# Altium PCB BLDC-Board.PcbDoc (part 1 of 7)
Units mm, origin at the board's own origin, x right, y up, seen from the top; angles counter-clockwise.
Board outline 150 x 117 mm, 4 copper layers (Top Layer, Layer 1, Layer 2, Bottom Layer), stack 1.566 mm thick; 307 components, 221 nets, 983 pads, 534 vias.
Unrouted connection lines stored in the file: 337.
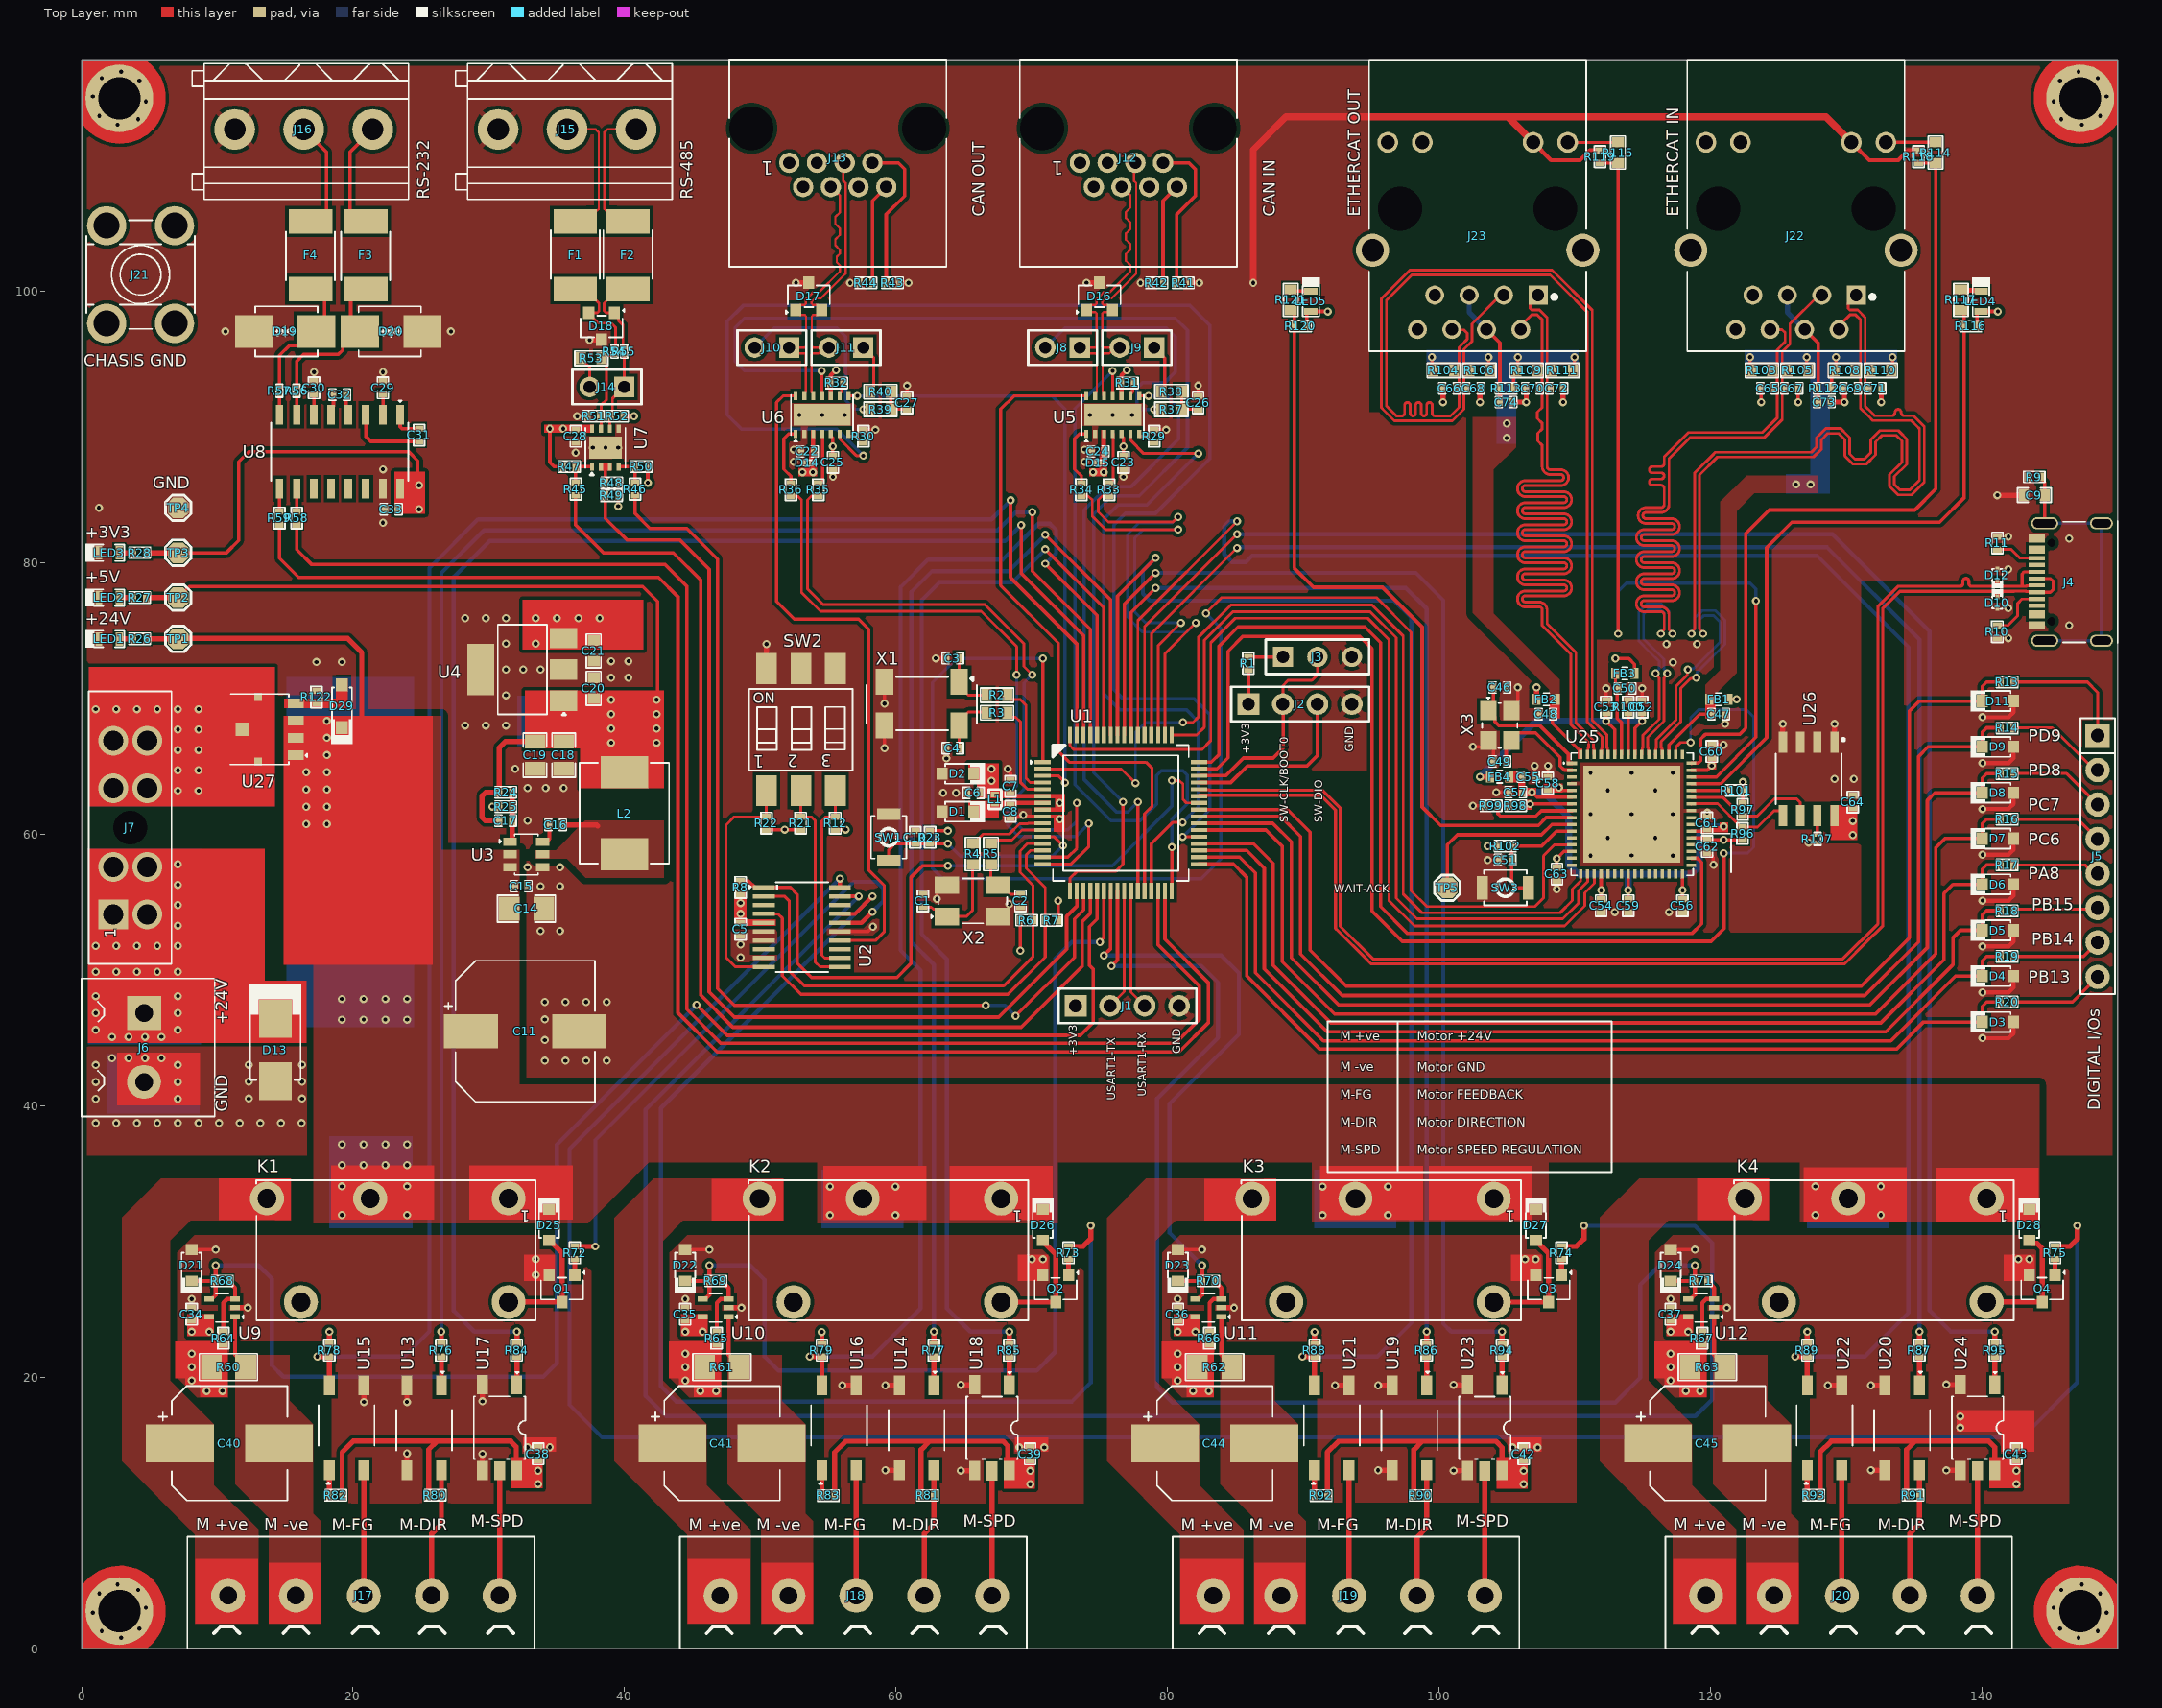
[diagram p0: Top Layer view]
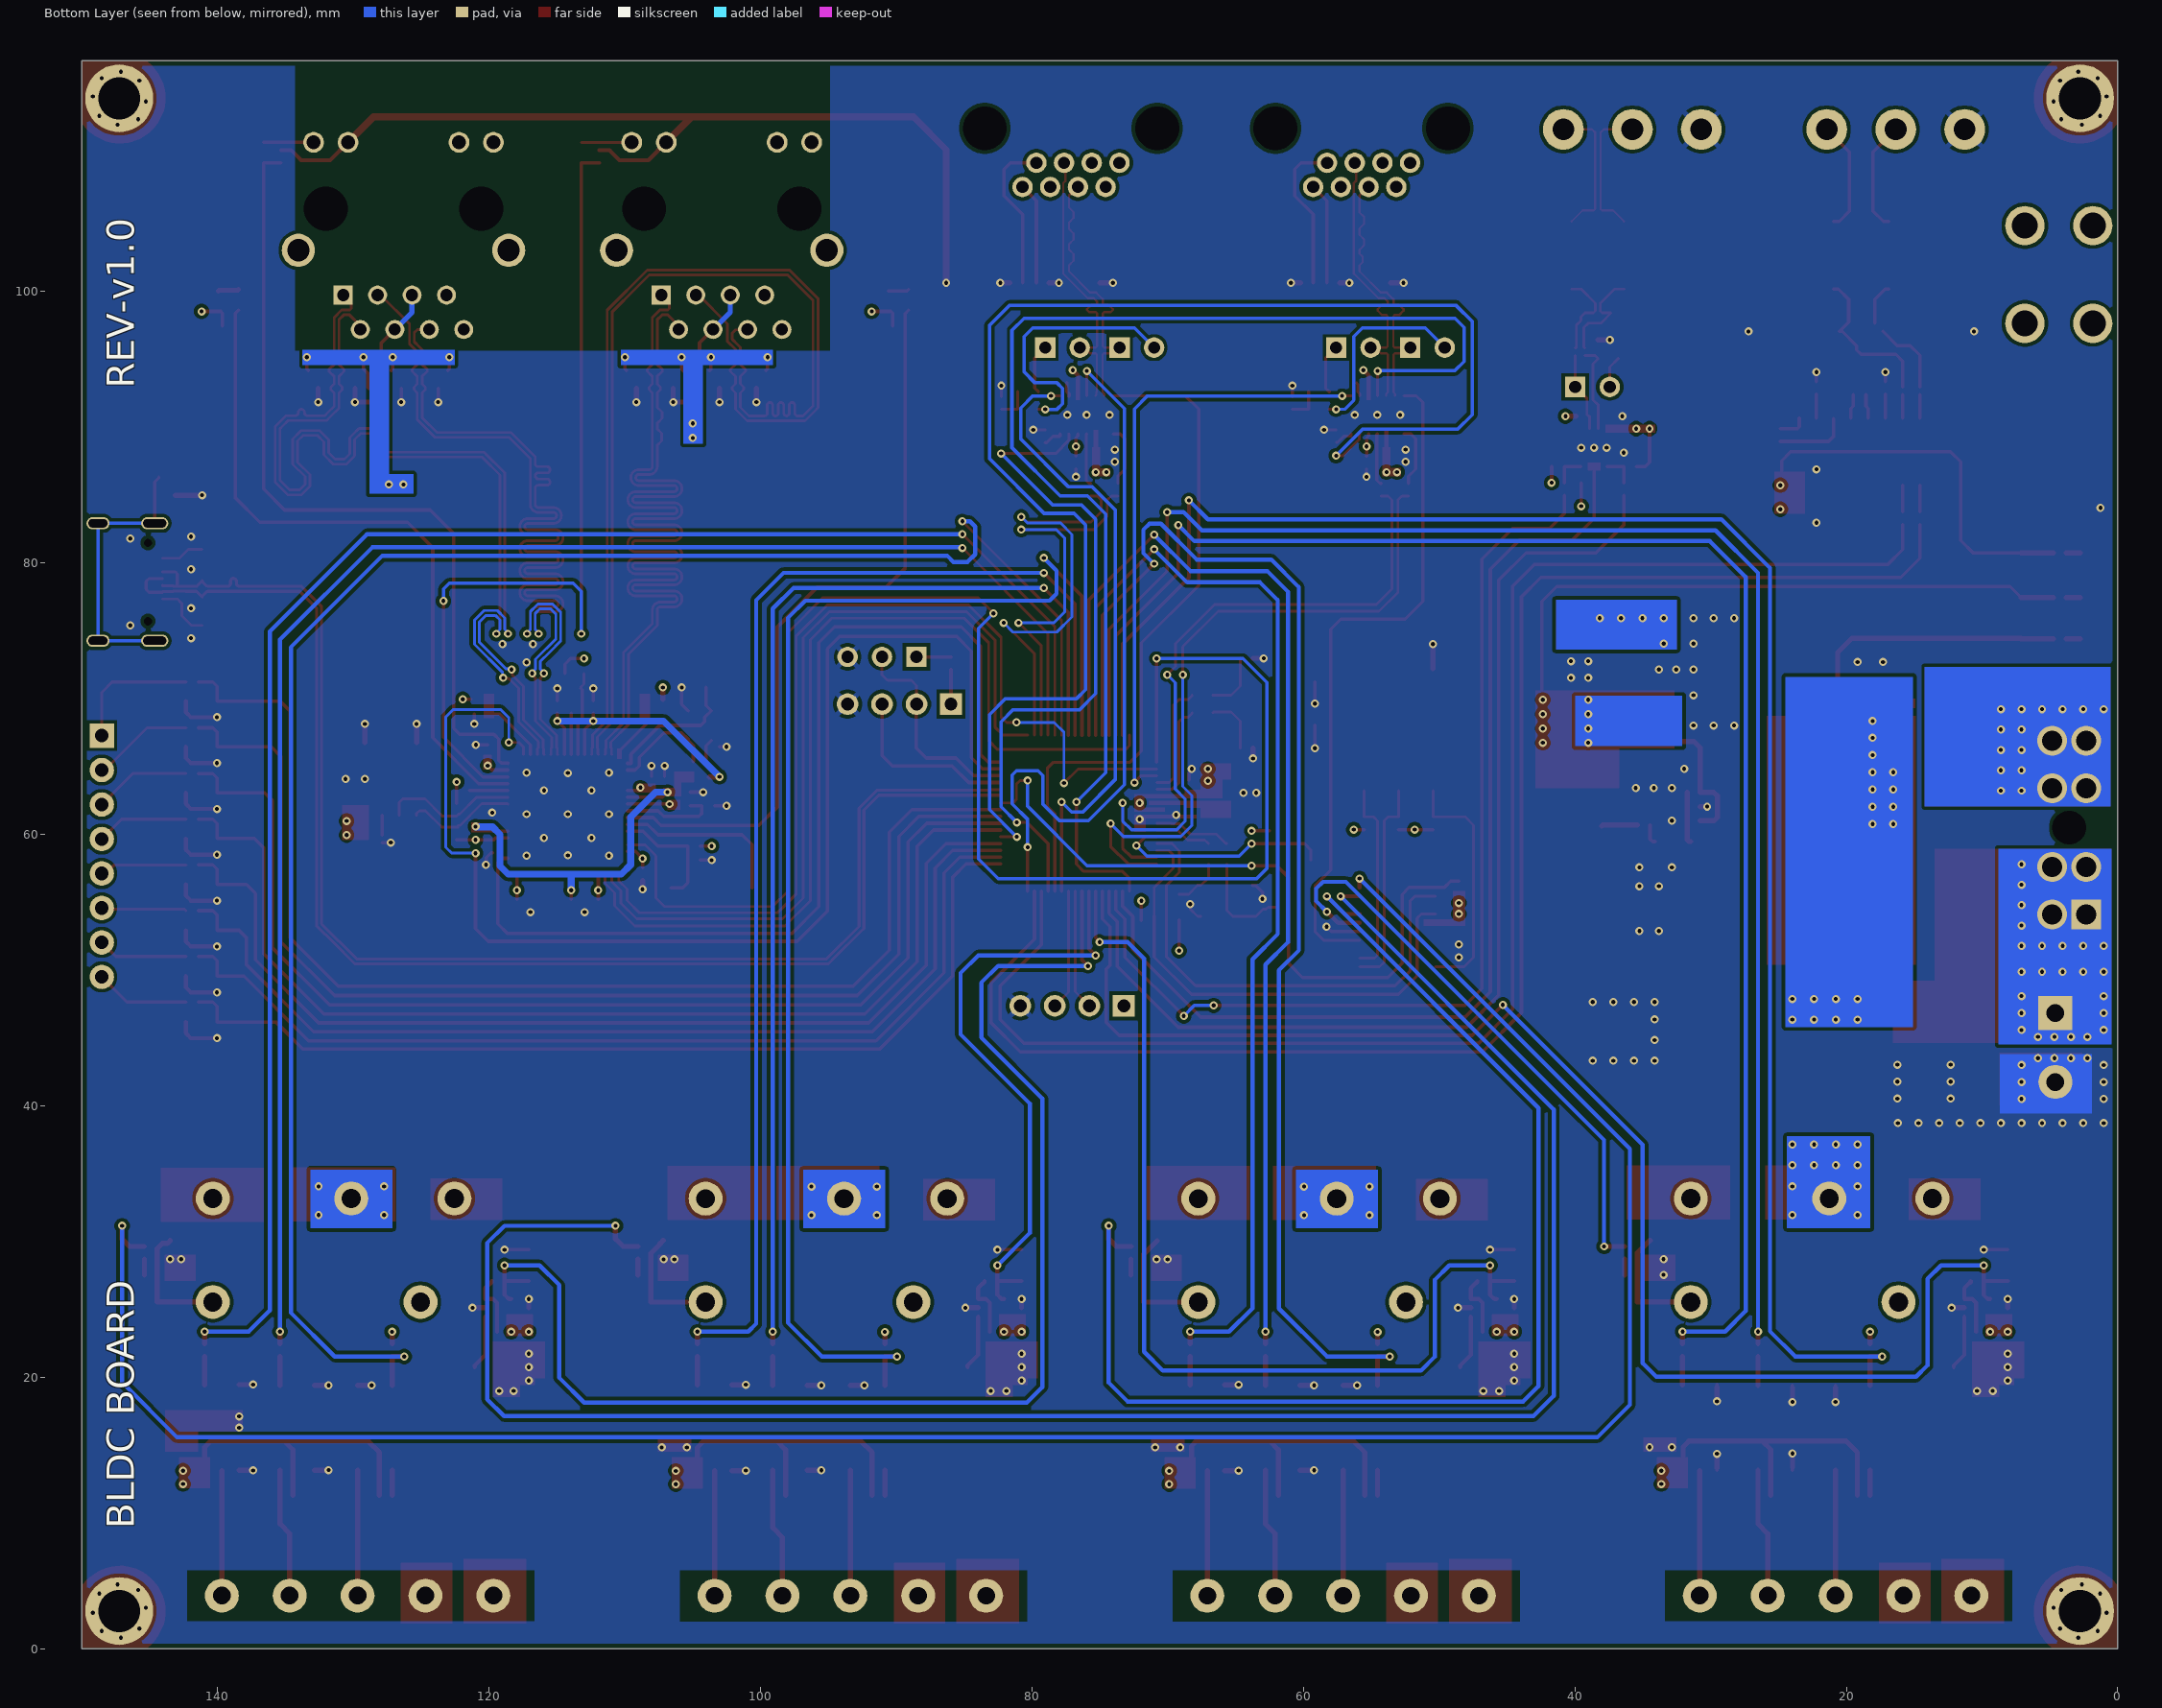
[diagram p1: Bottom Layer view, seen from below]
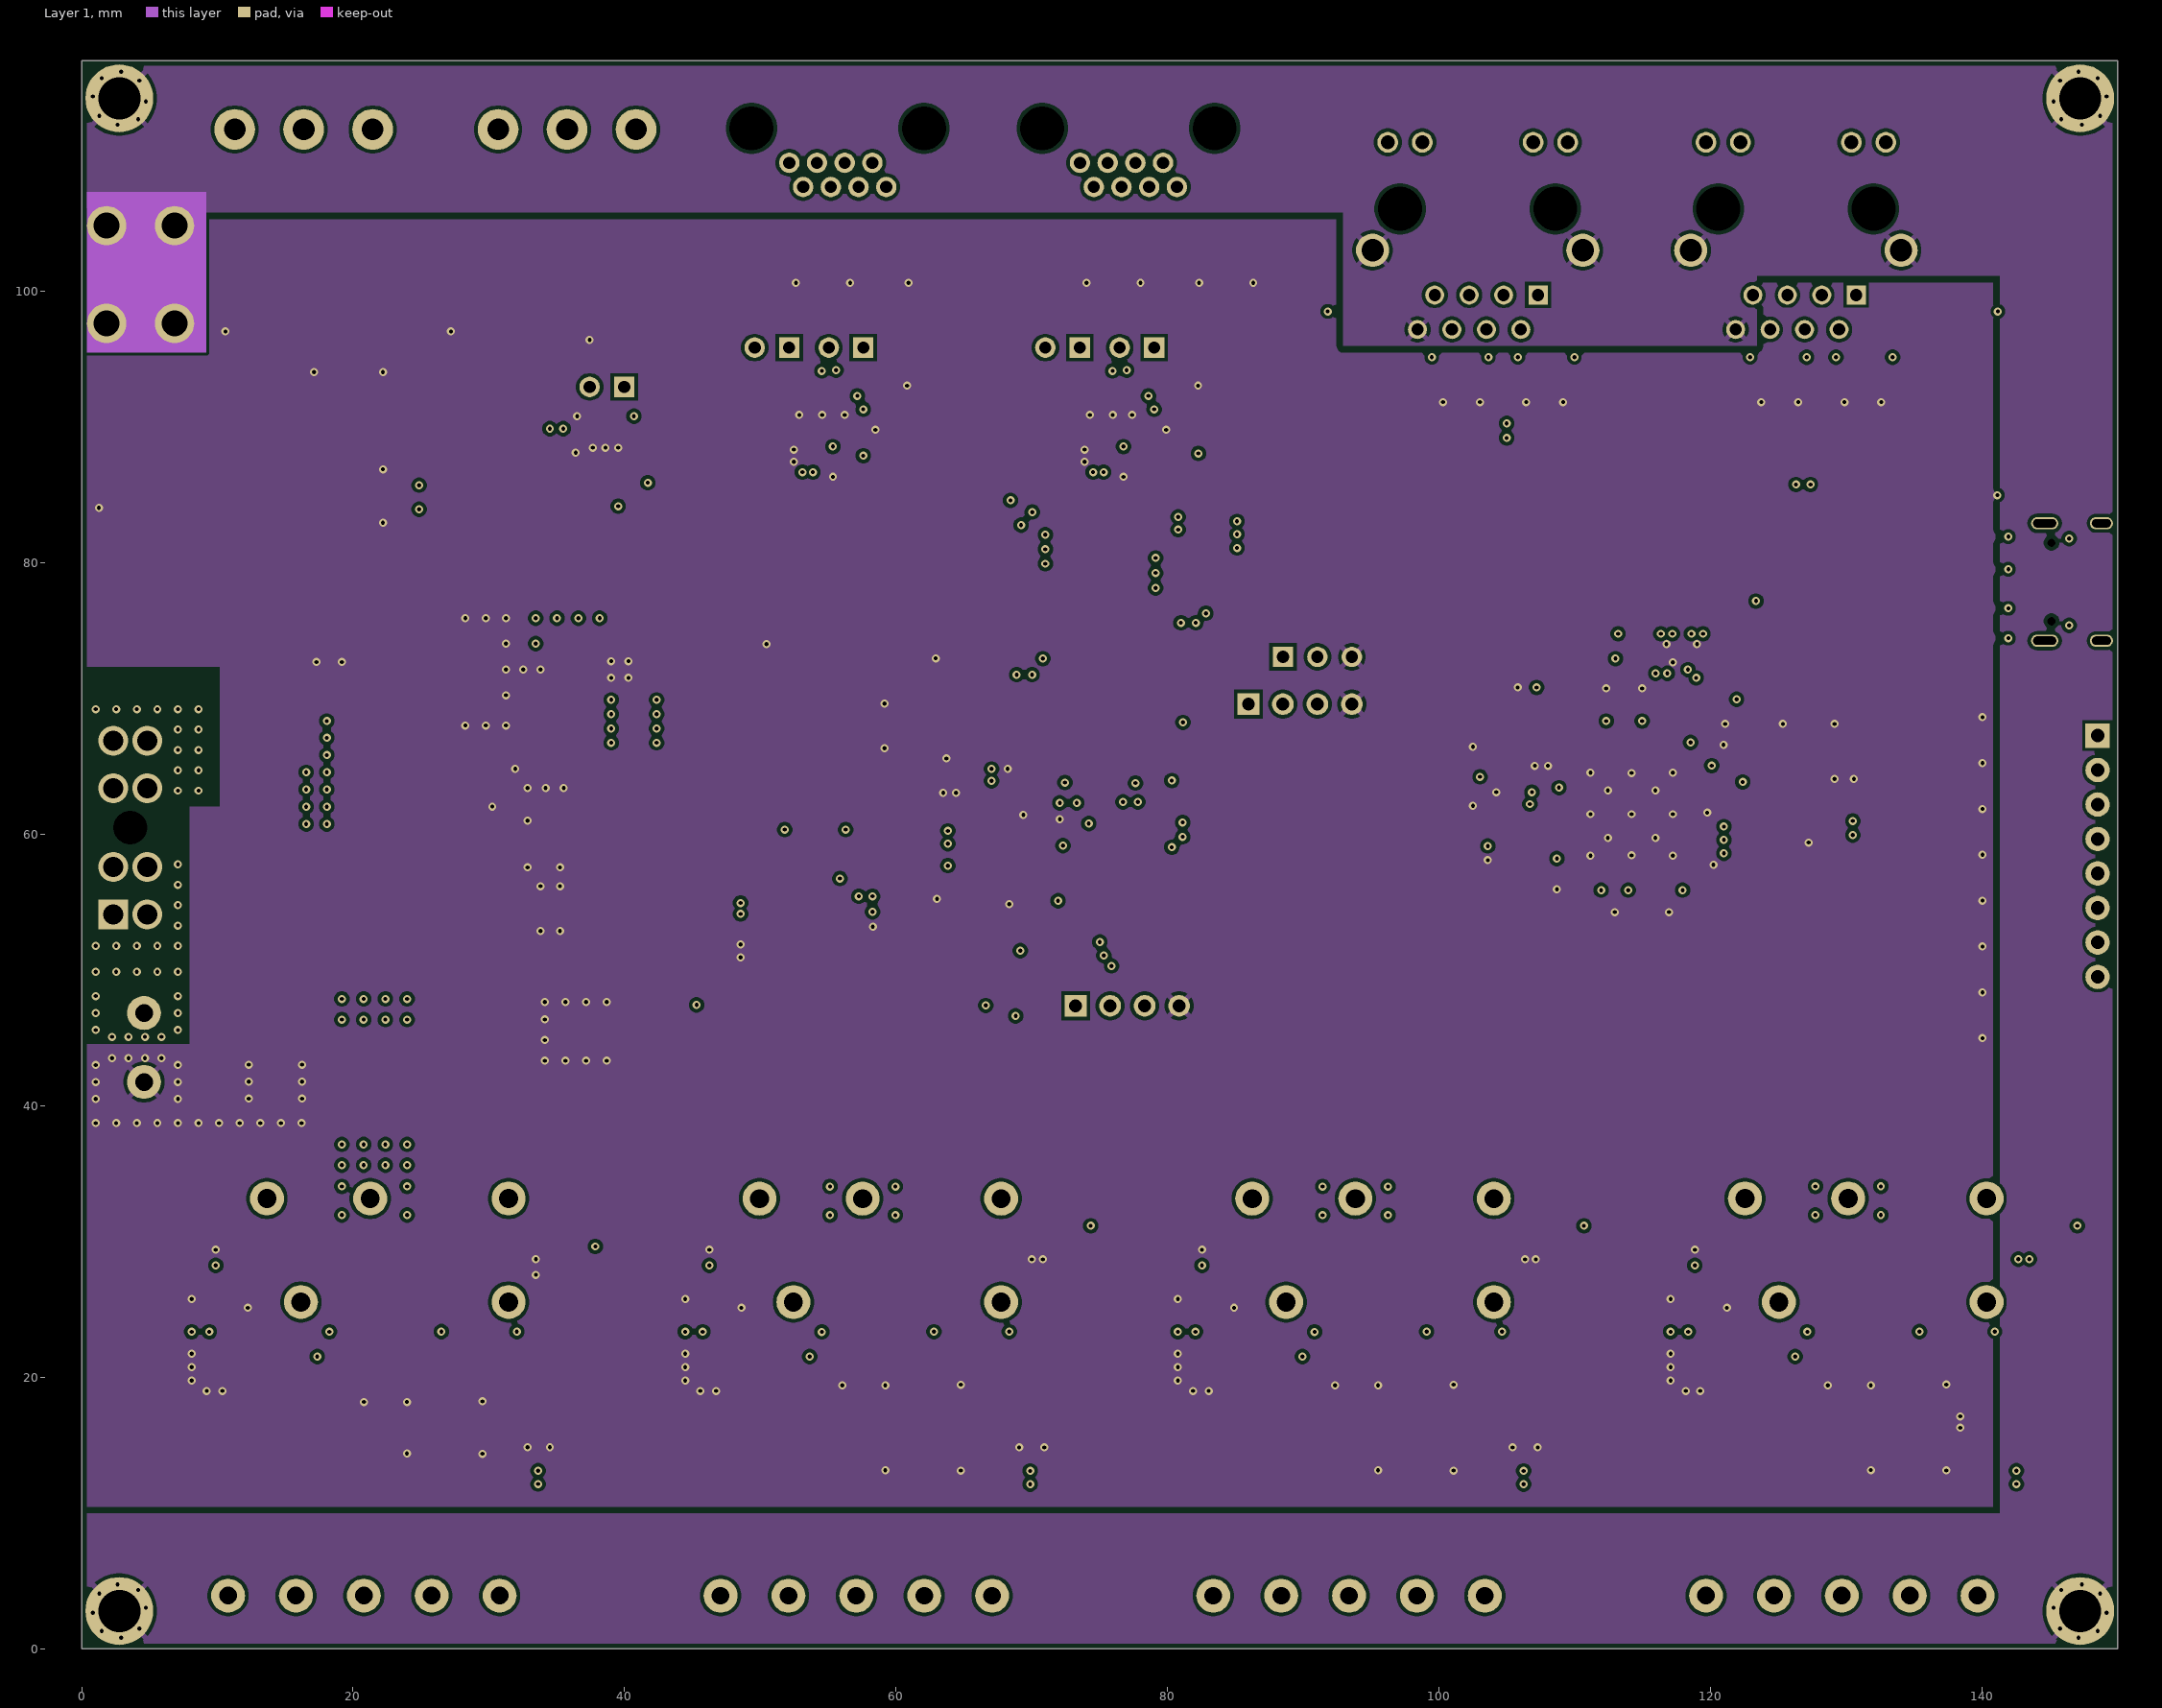
[diagram p2: Layer 1]
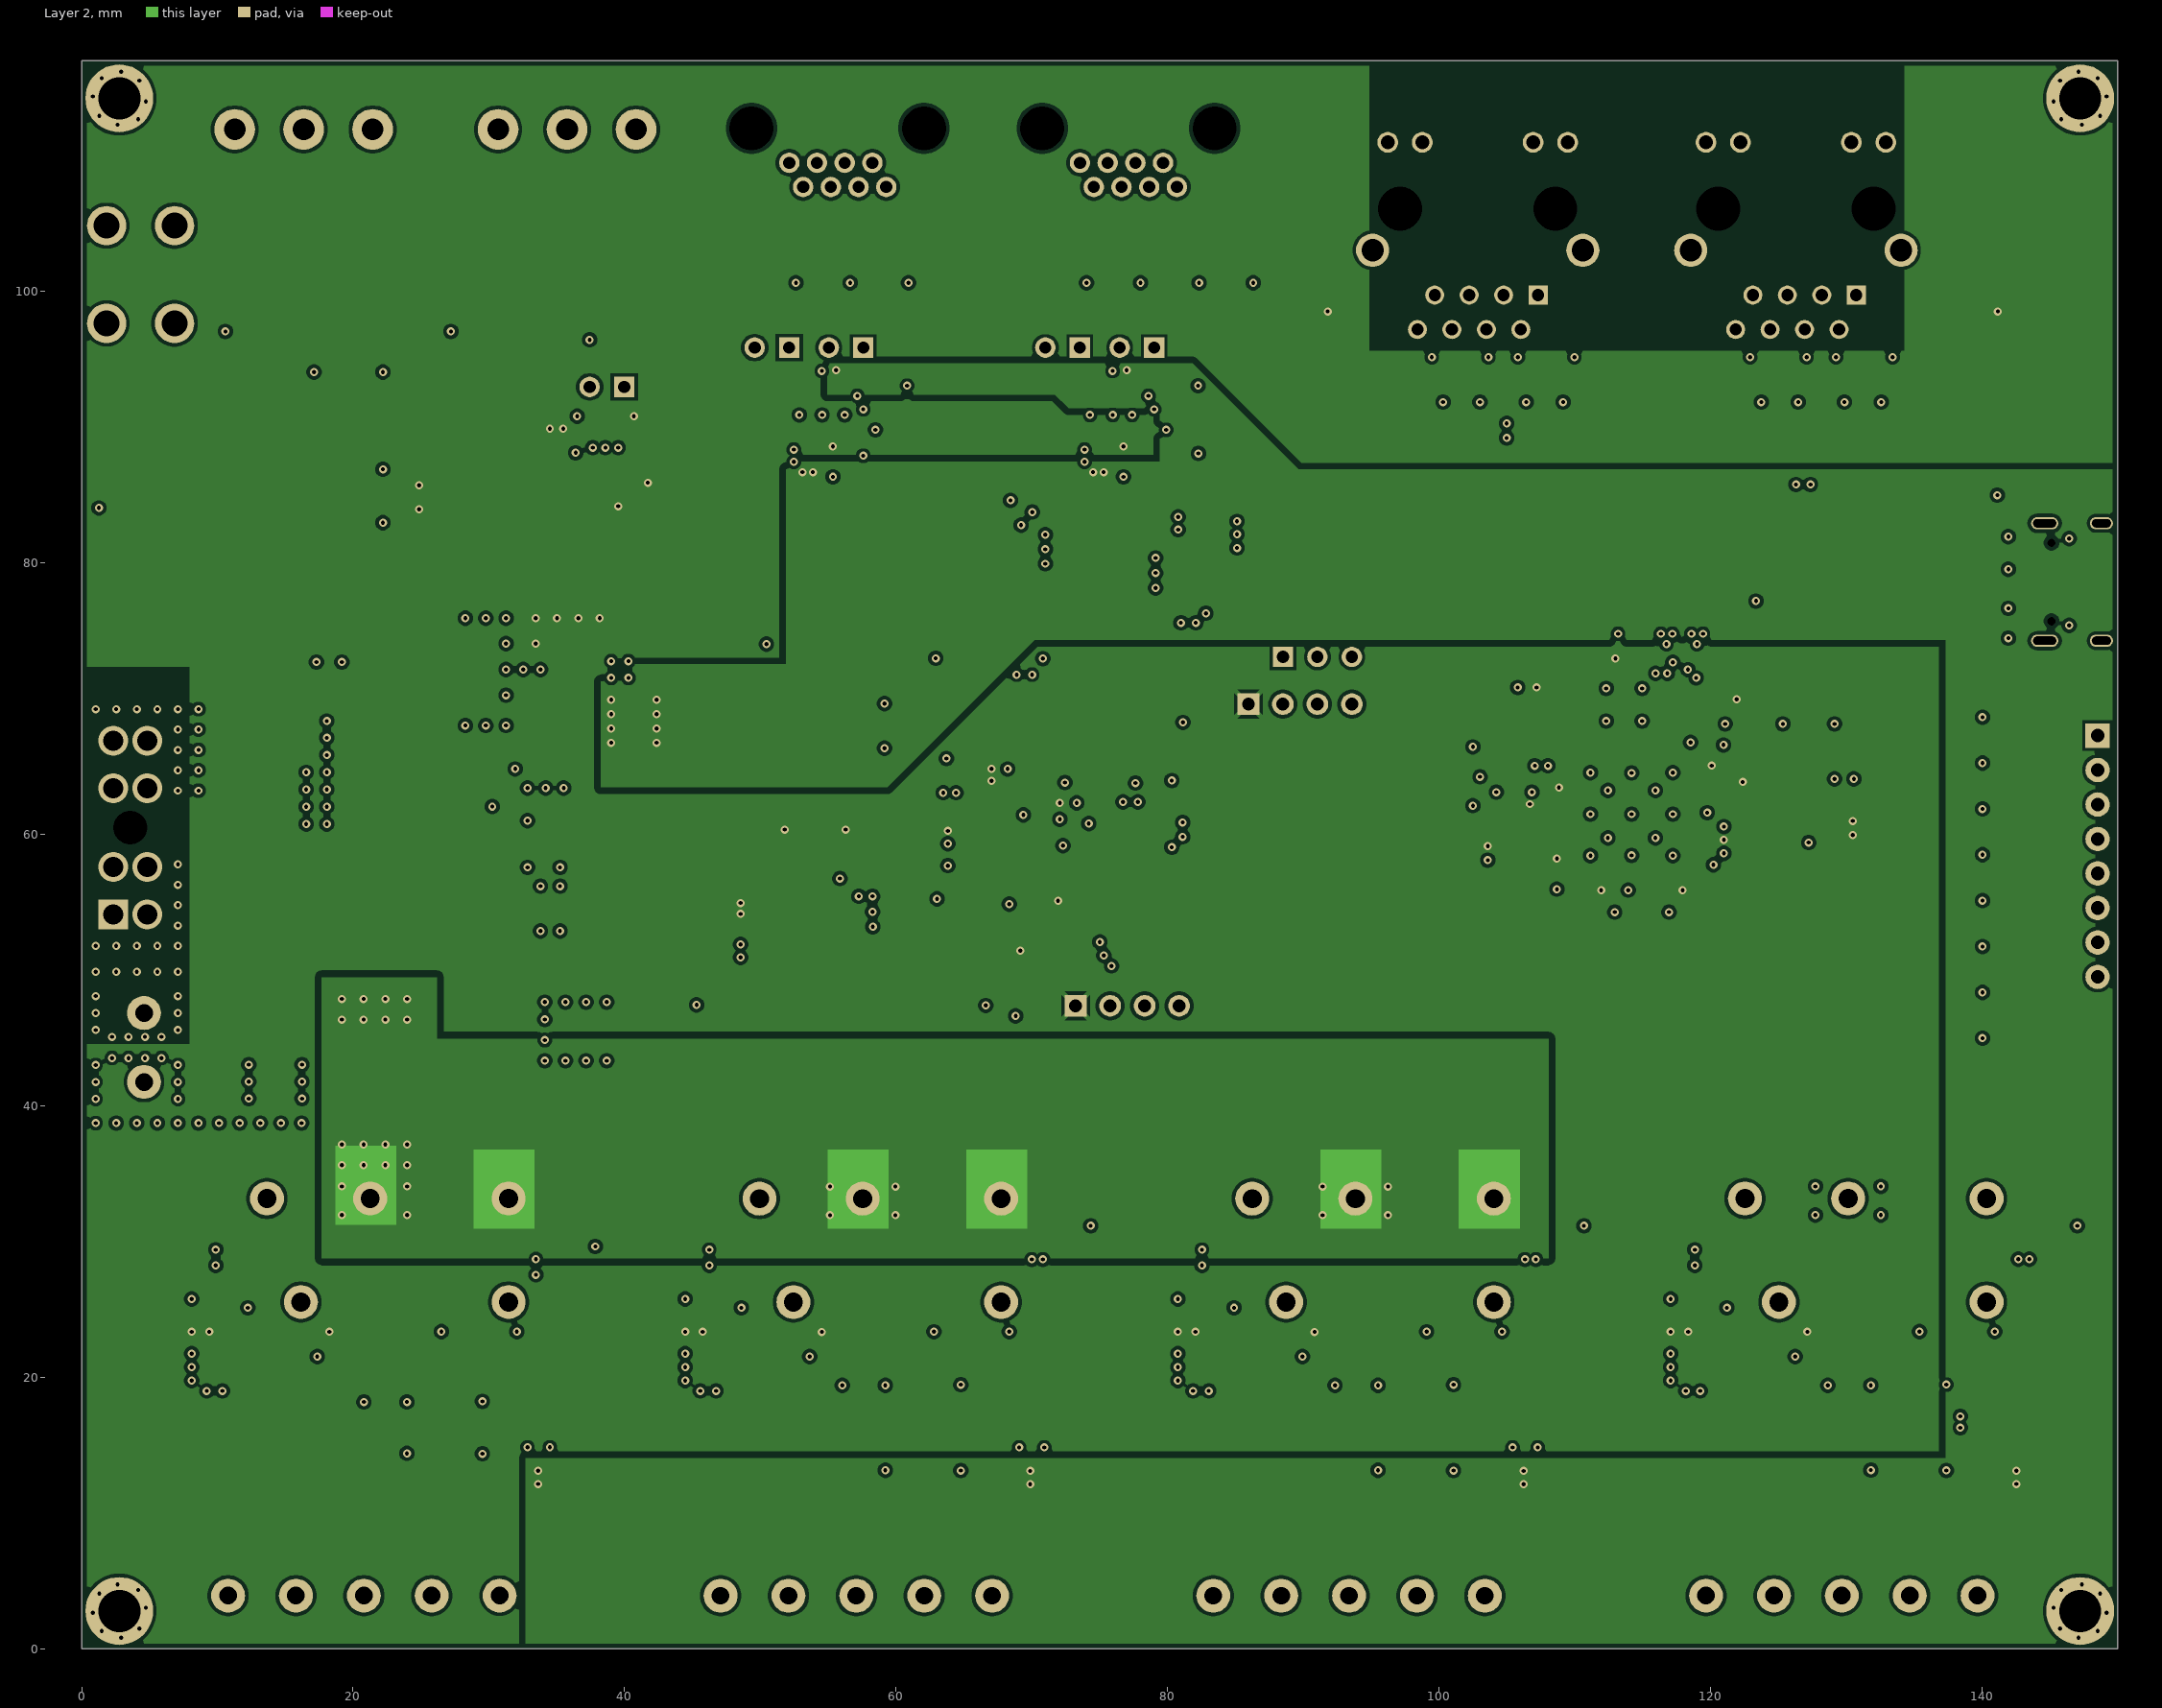
[diagram p3: Layer 2]
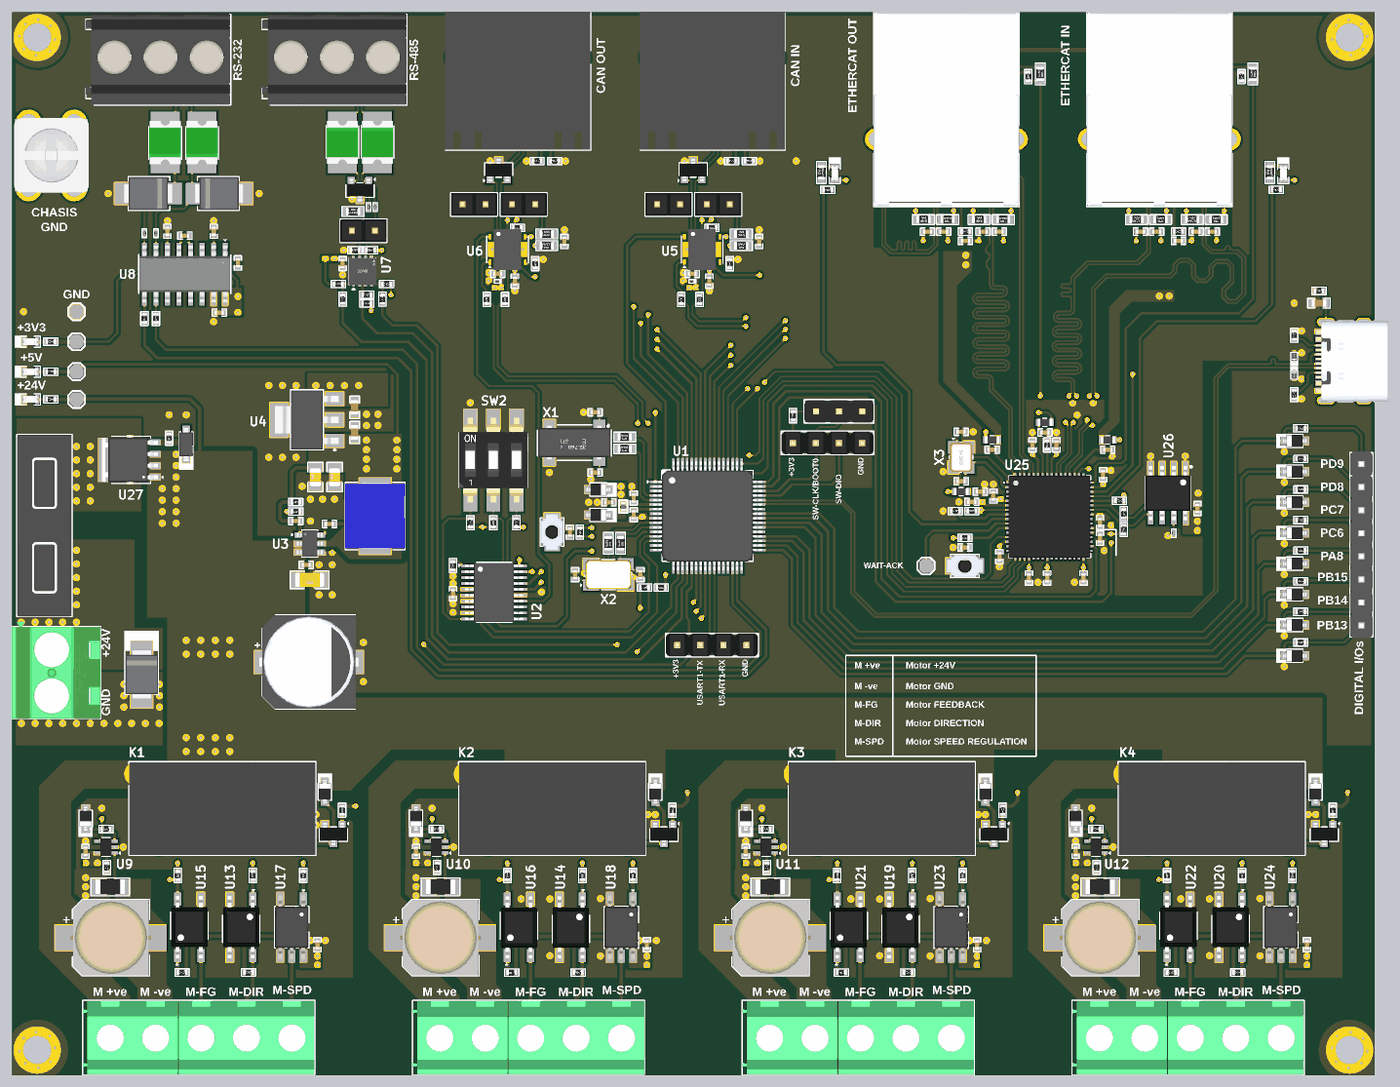
[diagram p7: 3D render of the assembled board from above, using the file's embedded part models]

## Layer stack, top to bottom
Top Solder: solder mask 0.02, Solder Resist, Dk 3.5
Top Layer: signal copper 0.035
Dielectric 2: prepreg 0.203, PP-006, Dk 4.4
Layer 1: signal copper 0.03
Dielectric 1: core 1.03, FR-4, Dk 4.6
Layer 2: signal copper 0.03
Dielectric 3: prepreg 0.203, PP-006, Dk 4.4
Bottom Layer: signal copper 0.035
Bottom Solder: solder mask 0.02, Solder Resist, Dk 3.5

## Board outline
0,0 0,117 150,117 150,0

## Design rules (kind name [scope] priority, off if disabled: settings)
BoardOutlineClearance [All] p1: gap=0 ignorepadtopadclearanceinfootprint=FALSE except(0.254: Fill-OutlineEdge; 0.381: Poly-OutlineEdge)
Clearance Clearance-CAN [All vs InDifferentialPairClass('CAN_Lines')] p1: gap=0.254 ignorepadtopadclearanceinfootprint=FALSE except(0.127: Arc-Arc Arc-Track Arc-THPad Track-Track Track-THPad SMDPad-Hole; 0.178: Arc-SMDPad Track-SMDPad SMDPad-SMDPad SMDPad-Fill Fill-Fill; 0.203: Track-Fill; 0.508: Poly-Poly)
Clearance [All] p2: gap=0.254 ignorepadtopadclearanceinfootprint=FALSE except(0.127: Arc-Arc Arc-Track Track-Track SMDPad-Hole; 0.178: Arc-SMDPad Track-SMDPad SMDPad-SMDPad SMDPad-Fill Fill-Fill; 0.203: Track-Fill; 0.508: Poly-Poly)
DiffPairsRouting RS485 [InDifferentialPairClass('RS485_LINES')] p1: maxlimit=0.254 minlimit=0.254 mostfreqgap=0.254 toplayer_minwidth=0.165 toplayer_maxwidth=0.165 toplayer_prefwidth=0.165 bottomlayer_minwidth=0.165 bottomlayer_maxwidth=0.165 bottomlayer_prefwidth=0.165 impedanceprofiledriven=TRUE impedanceprofileid={7B78C0C8-B38E-4F03-9150-63696339F07D} impedanceprofilevalue=120.000000 maxuncoupledlength=12.7
DiffPairsRouting ETHERCAT [InDifferentialPairClass('EtherCAT_A_Lines')] p2: maxlimit=0.254 minlimit=0.152 mostfreqgap=0.254 toplayer_maxgap=0.152 toplayer_prefgap=0.152 toplayer_minwidth=0.203 toplayer_maxwidth=0.203 toplayer_prefwidth=0.203 bottomlayer_maxgap=0.152 bottomlayer_prefgap=0.152 bottomlayer_minwidth=0.203 bottomlayer_maxwidth=0.203 bottomlayer_prefwidth=0.203 impedanceprofiledriven=TRUE impedanceprofileid={4AFB6B3D-FB50-4189-B201-DBFAAD689A74} impedanceprofilevalue=100.000000 maxuncoupledlength=12.7
DiffPairsRouting USB [InDifferentialPairClass('USB_PROGRAM_LINES')] p3: maxlimit=0.254 minlimit=0.127 mostfreqgap=0.254 toplayer_maxgap=0.127 toplayer_prefgap=0.127 toplayer_minwidth=0.229 toplayer_maxwidth=0.229 toplayer_prefwidth=0.229 bottomlayer_maxgap=0.127 bottomlayer_prefgap=0.127 bottomlayer_minwidth=0.229 bottomlayer_maxwidth=0.229 bottomlayer_prefwidth=0.229 impedanceprofiledriven=TRUE impedanceprofileid={D1DE48A6-6D34-48E4-B397-E0FB9A926E1D} impedanceprofilevalue=90.000000 maxuncoupledlength=12.7
DiffPairsRouting CAN [InDifferentialPairClass('CAN_Lines')] p4: maxlimit=0.254 minlimit=0.254 mostfreqgap=0.254 toplayer_minwidth=0.165 toplayer_maxwidth=0.165 toplayer_prefwidth=0.165 bottomlayer_minwidth=0.165 bottomlayer_maxwidth=0.165 bottomlayer_prefwidth=0.165 impedanceprofiledriven=TRUE impedanceprofileid={7B78C0C8-B38E-4F03-9150-63696339F07D} impedanceprofilevalue=120.000000 maxuncoupledlength=12.7
HoleSize [All] p1: absolutevalues=TRUE maxlimit=3.81 minlimit=0.025 maxpercent=80.000 minpercent=20.000
MatchedLengths "Schematic Matched Net Lengths_2" [InNetClass('USB_PROGRAM')] p1: tolerance=1.27 checknetsindiffpair=TRUE checkdiffpairvsdiffpair=FALSE checkxsignals=FALSE checkothers=FALSE
MatchedLengths "Schematic Matched Net Lengths_1" [InNetClass('EtherCAT_A')] p2: tolerance=0.645 checknetsindiffpair=FALSE checkdiffpairvsdiffpair=TRUE checkxsignals=TRUE checkothers=TRUE
MatchedLengths "Schematic Matched Net Lengths" [InNetClass('RS485')] p3: tolerance=0.508 checknetsindiffpair=TRUE checkdiffpairvsdiffpair=FALSE checkxsignals=FALSE checkothers=FALSE
MaxMinImpedance "Schematic Impedance Constraint_2" [InNetClass('RS485')] p1: minimum=115.0 maximum=125.0
MaxMinImpedance "Schematic Impedance Constraint_1" [InNetClass('EtherCAT_A')] p2: minimum=85.00 maximum=95.00
MaxMinImpedance "Schematic Impedance Constraint" [InNetClass('USB_PROGRAM')] p3: minimum=85.00 maximum=90.00
MinimumSolderMaskSliver [All] p1: minsoldermaskwidth=0
PolygonConnect [All] p1: thpad.connectstyle=Relief thpad.reliefconductorwidth=0.381 thpad.reliefentries=4 thpad.polygonreliefangle="45 Angle" thpad.airgapwidth=0.254 smdpad.connectstyle=Direct smdpad.reliefconductorwidth=0.254 smdpad.reliefentries=4 smdpad.polygonreliefangle="90 Angle" smdpad.airgapwidth=0.254 via.connectstyle=Direct via.reliefconductorwidth=0.254 via.reliefentries=4 via.polygonreliefangle="90 Angle" via.airgapwidth=0.254
RoutingVias [All] p1: holewidth=0.3 width=0.6 viastyle="Through Hole" minholewidth=0.3 minwidth=0.6 maxholewidth=0.3 maxwidth=0.6
SilkToSilkClearance [All] p1: silktosilkclearance=0
SilkToSolderMaskClearance [IsPad] p1: minsilkscreentomaskgap=0 clearancetoexposedcopper=TRUE
SolderMaskExpansion [All] p1: expansion=0.102 istentingtop=FALSE
SupplyNets "Schematic Supply Nets_9" [InNet('VDD33TXRX1')] p1: voltage=0.000
SupplyNets "Schematic Supply Nets_8" [InNet('+3V3')] p2: voltage=0.000
SupplyNets "Schematic Supply Nets_7" [InNet('VDD33TXRX2')] p3: voltage=0.000
SupplyNets "Schematic Supply Nets_6" [InNet('CHASIS GND')] p4: voltage=0.000
SupplyNets "Schematic Supply Nets_5" [InNet('GND')] p5: voltage=0.000
SupplyNets "Schematic Supply Nets_4" [InNet('+5V')] p6: voltage=0.000
SupplyNets "Schematic Supply Nets_3" [InNet('VBUS')] p7: voltage=0.000
SupplyNets "Schematic Supply Nets_2" [InNet('+24V')] p8: voltage=0.000
SupplyNets "Schematic Supply Nets_1" [InNet('VDDCR')] p9: voltage=0.000
SupplyNets "Schematic Supply Nets" [InNet('VDD12TX1')] p10: voltage=0.000
UnRoutedNet [All] p1: checkbadconnections=TRUE
Width [All] p1: maxlimit=0.508 minlimit=0.203 preferedwidth=0.254 midlayer1_minwidth=0.254 midlayer1_maxwidth=0.254 midlayer2_minwidth=0.254 midlayer2_maxwidth=0.254 minimp=50.000000 maximp=50.000000 favimp=50.000000
24 further rules are at their usual default settings.

## Classes and differential pairs
differential pair class USB_PROGRAM_LINES: USB
differential pair class RS485_LINES: RS485
differential pair class EtherCAT_A_Lines: RXA RXB TXA TXB
differential pair class CAN_Lines: CAN1 CAN2
net class USB_PROGRAM: USB_N USB_P
net class RS485: RS485_N RS485_P
net class EtherCAT_A: RXA_N RXA_P RXB_N RXB_P TXA_N TXA_P TXB_N TXB_P
net class CAN: CAN1_N CAN1_P CAN2_N CAN2_P
component class U_RS485_RS232_Sheet: C28 C29 C30 C31 C32 C33 D18 D19 D20 F1 F2 F3 F4 J14 R45 R46 R47 R48 R49 R50 R51 R52 R53 R54 R55 R56 R57 R58 R59 U7 U8
component class U_Power_Sheet: C11 C14 C15 C16 C17 C18 C19 C20 C21 D13 D29 J6 J7 L2 LED1 LED2 LED3 R24 R25 R26 R27 R28 R122 TP1 TP2 TP3 TP4 U3 U4 U27
component class U_Motor_Driver_Sheet: C34 C35 C36 C37 D21 D22 D23 D24 D25 D26 D27 D28 K1 K2 K3 K4 Q1 Q2 Q3 Q4 R60 R61 R62 R63 R64 R65 R66 R67 R68 R69 R70 R71 R72 R73 R74 R75 U9 U10 U11 U12
component class U_EtherCAT_Sheet: C46 C47 C48 C49 C50 C51 C52 C53 C54 C55 C56 C57 C58 C59 C60 C61 C62 C63 C64 C65 C66 C67 C68 C69 C70 C71 C72 C73 C74 FB1 FB2 FB3 FB4 J21 J22 J23 LED4 LED5 R96 R97 R98 R99 R100 R101 R102 R103 R104 R105 R106 R107 R108 R109 R110 R111 R112 R113 R114 R115 R116 R117 R118 R119 R120 R121 SW3 TP5 U25 U26 X3
component class U_Controller_Sheet: C1 C2 C3 C4 C5 C6 C7 C8 C9 C10 D1 D2 D3 D4 D5 D6 D7 D8 D9 D10 D11 D12 J1 J2 J3 J4 J5 L1 R1 R2 R3 R4 R5 R6 R7 R8 R9 R10 R11 R12 R13 R14 R15 R16 R17 R18 R19 R20 R21 R22 R23 SW1 SW2 U1 U2 X1 X2
component class U_Connector_Sheet2: C42 C43 C44 C45 J19 J20 R86 R87 R88 R89 R90 R91 R92 R93 R94 R95 U19 U20 U21 U22 U23 U24
component class U_Connector_Sheet1: C38 C39 C40 C41 J15 J16 J17 J18 R76 R77 R78 R79 R80 R81 R82 R83 R84 R85 U13 U14 U15 U16 U17 U18
component class U_CAN_Sheet: C22 C23 C24 C25 C26 C27 D14 D15 D16 D17 J8 J9 J10 J11 J12 J13 R29 R30 R31 R32 R33 R34 R35 R36 R37 R38 R39 R40 R41 R42 R43 R44 U5 U6
differential pair USB: +USB_P -USB_N
differential pair TXB: +TXB_P -TXB_N
differential pair TXA: +TXA_P -TXA_N
differential pair RXB: +RXB_P -RXB_N
differential pair RXA: +RXA_P -RXA_N
differential pair RS485: +RS485_P -RS485_N
differential pair CAN2: +CAN2_P -CAN2_N
differential pair CAN1: +CAN1_P -CAN1_N

## Components (designator, comment, footprint, x,y, rotation, side; value= is the part's Value field where it differs from the comment)
C1 "30pF" Cap-0402 61.981,55.097 r270 top
C2 "30pF" Cap-0402 69.169,55.097 r90 top
C3 "DNP" Cap-0402 64.173,72.968 r0 top value=6.8pF
C4 "DNP" Cap-0402 64.173,66.338 r180 top value=6.8pF
C5 "100nF" cap-0402 48.539,53.011 r90 top
C6 "4.7uF" Cap-0402 65.697,63.062 r0 top
C7 "100nF" cap-0402 68.428,63.532 r270 top
C8 "0.1uF" Cap-0402 68.428,61.693 r90 top value=100nF
C9 "4.7nF" Cap-0603 143.848,84.982 r0 top
C10 "0.1uF" Cap-0402 61.409,59.783 r270 top value=100nF
C11 "220uF" UCD-220uF-10mmDia 32.676,45.478 r0 top
C14 "10uF" Cap-1206 32.766,54.527 r180 top
C15 "100nF" cap-0402 32.385,56.178 r180 top
C16 "0.1uF" Cap-0402 34.927,60.681 r180 top
C17 "47pF" Cap-0402 31.24,60.998 r180 top
C18 "22uF" Cap-0805 35.509,65.83 r90 top
C19 "22uF" Cap-0805 33.401,65.83 r90 top
C20 "4.7uF" Cap-0603 37.719,70.758 r270 top
C21 "4.7uF" Cap-0603 37.719,73.516 r90 top
C22 "0.1uF" Cap-0402 53.465,88.208 r180 top value=100nF
C23 "0.1uF" Cap-0402 76.75,87.395 r90 top value=100nF
C24 "0.1uF" Cap-0402 74.879,88.208 r180 top value=100nF
C25 "0.1uF" Cap-0402 55.347,87.395 r90 top value=100nF
C26 "4.7nF" Cap-0402 82.245,91.776 r90 top
C27 "4.7nF" Cap-0402 60.808,91.776 r90 top
C28 "0.1uf" Cap-0402 36.395,89.332 r90 top
C29 "0.1uf" Cap-0402 22.197,92.894 r270 top
C30 "0.1uf" Cap-0402 17.117,92.894 r270 top
C31 "0.1uf" Cap-0402 24.867,89.414 r270 top
C32 "0.1uf" Cap-0402 19.022,92.399 r180 top
C33 "0.1uf" Cap-0402 22.809,83.94 r0 top
C34 "100nF" cap-0402 8.106,24.646 r270 top
C35 "100nF" cap-0402 44.462,24.646 r270 top
C36 "100nF" cap-0402 80.759,24.646 r270 top
C37 "100nF" cap-0402 117.059,24.646 r270 top
C38 "100nF" cap-0402 33.625,14.365 r270 top
C39 "100nF" cap-0402 69.875,14.357 r270 top
C40 "100uF" UWX1E101MCL1GB_ 10.89,15.14 r0 top
C41 "100uF" UWX1E101MCL1GB_ 47.17,15.14 r0 top
C42 "100nF" cap-0402 106.223,14.357 r270 top
C43 "100nF" cap-0402 142.523,14.365 r270 top
C44 "100uF" UWX1E101MCL1GB_ 83.467,15.14 r0 top
C45 "100uF" UWX1E101MCL1GB_ 119.767,15.14 r0 top
C46 "30pF" Cap-0402 104.469,70.819 r180 top
C47 "100nF" cap-0402 120.608,68.853 r180 top
C48 "100nF" cap-0402 107.878,68.853 r0 top
C49 "30pF" Cap-0402 104.469,65.368 r0 top
C50 "100nF" cap-0402 113.694,70.748 r180 top
C51 "100nF" cap-0402 104.877,58.096 r0 top
C52 "100nF" cap-0402 114.952,69.374 r270 top
C53 "100nF" cap-0402 112.314,69.374 r270 top
C54 "100nF" cap-0402 111.935,54.734 r90 top
C55 "1uF" Cap-0402 106.578,64.231 r180 top
C56 "100nF" cap-0402 117.935,54.734 r90 top
C57 "470pF" Cap-0402 105.639,63.106 r0 top
C58 "100nF" cap-0402 108.014,63.761 r270 top
C59 "100nF" cap-0402 113.935,54.734 r90 top
C60 "100nF" cap-0402 120.091,66.11 r270 top
C61 "100nF" cap-0402 119.748,60.843 r270 top
C62 "100nF" cap-0402 119.748,59.109 r90 top
C63 "100nF" cap-0402 108.678,57.067 r90 top
C64 "100nF" cap-0402 130.48,62.376 r270 top
C65 "10pF" Cap-0402 124.206,92.856 r0 top
C66 "10pF" Cap-0402 100.766,92.856 r0 top
C67 "10pF" Cap-0402 125.985,92.856 r180 top
C68 "10pF" Cap-0402 102.545,92.856 r180 top
C69 "10pF" Cap-0402 130.327,92.856 r0 top
C70 "10pF" Cap-0402 106.888,92.856 r0 top
C71 "10pF" Cap-0402 132.105,92.856 r180 top
C72 "10pF" Cap-0402 108.666,92.856 r180 top
C73 "22nF" Cap-0402 128.384,91.84 r180 top
C74 "22nF" Cap-0402 104.945,91.84 r180 top
D1 "SD03" SOD-323 64.547,61.663 r180 top
D2 "SD03" SOD-323 64.547,64.463 r180 top
D3 "MM3Z3V3" SOD-323 141.166,46.171 r0 top
D4 "MM3Z3V3" SOD-323 141.166,49.549 r0 top
D5 "MM3Z3V3" SOD-323 141.166,52.927 r0 top
D6 "MM3Z3V3" SOD-323 141.166,56.305 r0 top
D7 "MM3Z3V3" SOD-323 141.166,59.683 r0 top
D8 "MM3Z3V3" SOD-323 141.166,63.062 r0 top
D9 "MM3Z3V3" SOD-323 141.166,66.44 r0 top
D10 "ESD9L5.0ST5G" SOD-923. 141.122,77.067 r270 top
D11 "MM3Z3V3" SOD-323 141.166,69.818 r0 top
D12 "ESD9L5.0ST5G" SOD-923. 141.122,79.103 r90 top
D13 "SMBJ28A-13-F" SMB_ 14.275,44.12 r90 top value=330pF
D14 "PESD5V0H1BSFYL" DSN0603-2 53.465,87.369 r180 top
D15 "PESD5V0H1BSFYL" DSN0603-2 74.879,87.369 r180 top
D16 "CDSOT23-T24CAN-Q" SOT-23 74.981,99.628 r0 top
D17 "CDSOT23-T24CAN-Q" SOT-23 53.569,99.628 r0 top
D18 "SM712" SOT-23 38.303,97.428 r180 top
D19 "SMBJ8.0CA" "SMB Bi Directional" 14.997,97.047 r0 top
D20 "SMBJ8.0CA" "SMB Bi Directional" 22.798,97.047 r180 top
D21 "MM3Z3V3" SOD-323 8.106,28.245 r90 top
D22 "MM3Z3V3" SOD-323 44.462,28.245 r90 top
D23 "MM3Z3V3" SOD-323 80.759,28.245 r90 top
D24 "MM3Z3V3" SOD-323 117.059,28.245 r90 top
D25 "1N4148WS-7-F" SOD-323 34.432,31.217 r270 top
D26 "1N4148WS-7-F" SOD-323 70.805,31.217 r270 top
D27 "1N4148WS-7-F" SOD-323 107.127,31.217 r270 top
D28 "1N4148WS-7-F" SOD-323 143.474,31.217 r270 top
D29 "BZT52C16" SOD-123 19.177,69.444 r270 top
F1 "MF-MSMF010-2" Fuse-1812_ 36.373,102.659 r90 top
F2 "MF-MSMF010-2" Fuse-1812_ 40.234,102.659 r90 top
F3 "MF-MSMF010-2" Fuse-1812_ 20.93,102.659 r270 top
F4 "MF-MSMF010-2" Fuse-1812_ 16.866,102.659 r270 top
FB1 "BLM18PG221SN1D" "IND-0603 (1608 Metric)" 120.608,69.942 r180 top value=100mR
FB2 "BLM18PG221SN1D" "IND-0603 (1608 Metric)" 107.878,69.942 r0 top value=100mR
FB3 "BLM18PG221SN1D" "IND-0603 (1608 Metric)" 113.694,71.85 r180 top value=100mR
FB4 "BLM18PG221SN1D" "IND-0603 (1608 Metric)" 104.469,64.231 r180 top value=100mR
J1 "X6511WV-04H-C60D30" HDR1X4_ 73.228,47.364 r0 top
J2 "X6511WV-04H-C60D30" HDR1X4_ 85.954,69.589 r0 top
J3 "68000-103HLF" HDR1X3_ 88.494,73.069 r0 top
J4 "TYPE-C-31-M-12" TYPE-C-31-M-12_ 146.415,78.587 r90 top
J5 "X6511WV-08H-C60D30" "HDR 1x8 TH male" 148.509,58.382 r270 top
J6 "1715721" 1715721 4.597,44.295 r270 top
J7 "178.6165.0002" 178.6165.0002 3.581,60.496 r90 top
J8 "X6511WV-02H-C60D30" HDR1X2_ 73.533,95.853 r180 top
J9 "X6511WV-02H-C60D30" HDR1X2_ 79.008,95.853 r180 top
J10 "X6511WV-02H-C60D30" HDR1X2_ 52.121,95.853 r180 top
J11 "X6511WV-02H-C60D30" HDR1X2_ 57.582,95.853 r180 top
J12 "X12ADIWA3DY1027" X12ADIWA3DY1027 77.114,109.847 r180 top
J13 "X12ADIWA3DY1027" X12ADIWA3DY1027 55.702,109.847 r180 top
J14 "X6511WV-02H-C60D30" HDR1X2_ 39.964,92.957 r180 top
J15 "DB128L-5.08-3P-BK-S" DB128L-5.08-3P-BK-S 35.763,111.931 r180 top
J16 "DB128L-5.08-3P-BK-S" DB128L-5.08-3P-BK-S 16.358,111.931 r180 top
J17 "WJ127-5.0-5P" WJ127-5.0-5P 20.79,3.913 r0 top
J18 "WJ127-5.0-5P" WJ127-5.0-5P 57.07,3.905 r0 top
J19 "WJ127-5.0-5P" WJ127-5.0-5P 93.367,3.905 r0 top
J20 "WJ127-5.0-5P" WJ127-5.0-5P 129.667,3.913 r0 top
J21 "T44001" T44001 4.343,101.238 r180 top
J22 "HR911105A" HR911105A 126.284,104.083 r0 top
J23 "HR911105A" HR911105A 102.845,104.083 r0 top
K1 "HF33F/024-ZS3" HF33F/024-ZS3 22.555,29.356 r180 top
K2 "HF33F/024-ZS3" HF33F/024-ZS3 58.835,29.348 r180 top
K3 "HF33F/024-ZS3" HF33F/024-ZS3 95.132,29.348 r180 top
K4 "HF33F/024-ZS3" HF33F/024-ZS3 131.432,29.356 r180 top
L1 "BLM15AG601SN1D" IND-0402 67.285,62.585 r270 top
L2 "6.8uH" 0630CDMCCDS_6R8MC 39.98,61.547 r90 top
LED1 "RED" LED-0603 2.02,74.39 r180 top
LED2 "RED" LED-0603 2.02,77.438 r180 top
LED3 "RED" LED-0603 2.02,80.74 r180 top
LED4 "Emerald" LED-0603 139.924,99.27 r90 top
LED5 "RED" LED-0603 90.559,99.27 r90 top
Q1 "BC846B-7-F" SOT-23 35.382,26.546 r180 top
Q2 "BC846B-7-F" SOT-23 71.755,26.538 r180 top
Q3 "BC846B-7-F" SOT-23 108.077,26.538 r180 top
Q4 "BC846B-7-F" SOT-23 144.424,26.546 r180 top
R1 "10K" Res-0402 85.954,72.599 r270 top
R2 "DNP" Res-0603 67.437,70.25 r0 top
R3 "DNP" Res-0603 67.437,68.954 r0 top
R4 "0R" Res-0603 65.638,58.551 r90 top
R5 "0R" Res-0603 66.985,58.551 r90 top
R6 "4.7K" Res-0402 69.623,53.667 r180 top
R7 "4.7K" Res-0402 71.458,53.667 r0 top
R8 "10K" Res-0402 48.539,56.081 r270 top
R9 "1M" Res-0402 143.848,86.328 r180 top
R10 "5.1K" Res-0402 141.122,74.917 r270 top
R11 "5.1K" Res-0402 141.122,81.457 r90 top
R12 "10K" Res-0402 55.524,60.814 r270 top
R13 "33R" Res-0402 141.847,71.213 r0 top
R14 "33R" Res-0402 141.847,67.845 r0 top
R15 "33R" Res-0402 141.847,64.478 r0 top
R16 "33R" Res-0402 141.847,61.111 r0 top
R17 "33R" Res-0402 141.847,57.743 r0 top
R18 "33R" Res-0402 141.847,54.376 r0 top
R19 "33R" Res-0402 141.847,51.009 r0 top
R20 "33R" Res-0402 141.847,47.641 r0 top
R21 "10K" Res-0402 52.984,60.814 r270 top
R22 "10K" Res-0402 50.444,60.814 r270 top
R23 "10K" Res-0402 62.502,59.783 r90 top
R24 "158K" Res-0402 31.242,63.087 r180 top
R25 "30.1K" Res-0402 31.242,62.043 r0 top
R26 "3.9K" Res-0402 4.28,74.39 r180 top value=3.9kR
R27 "470R" Res-0402 4.28,77.438 r180 top
R28 "200R" Res-0402 4.28,80.74 r180 top
R29 "100K" Res-0402 79.007,89.327 r270 top
R30 "100K" Res-0402 57.582,89.327 r270 top
R31 "33K" Res-0402 77.038,93.262 r0 top
R32 "33K" Res-0402 55.626,93.262 r0 top
R33 "0R" Res-0402 75.679,85.388 r270 top
R34 "0R" Res-0402 73.661,85.388 r270 top
R35 "0R" Res-0402 54.265,85.388 r270 top
R36 "0R" Res-0402 52.246,85.388 r270 top
R37 "60.4R" Res-0603 80.277,91.306 r0 top
R38 "60.4R" Res-0603 80.277,92.602 r180 top
R39 "60.4R" Res-0603 58.852,91.306 r0 top
R40 "60.4R" Res-0603 58.852,92.602 r180 top
R41 "0R" Res-0402 81.154,100.628 r180 top
R42 "0R" Res-0402 79.194,100.628 r0 top
R43 "0R" Res-0402 59.742,100.628 r180 top
R44 "0R" Res-0402 57.782,100.628 r0 top
R45 "0R" Res-0402 36.395,85.426 r90 top
R46 "0R" Res-0402 40.767,85.426 r90 top
R47 "4.7K" Res-0402 35.925,87.084 r180 top
R48 "4.7K" Res-0402 39.053,85.896 r0 top
R49 "4.7K" Res-0402 39.053,84.955 r0 top
R50 "4.7K" Res-0402 41.237,87.084 r0 top
R51 "4.7K" Res-0402 37.73,90.801 r180 top
R52 "4.7K" Res-0402 39.46,90.801 r180 top
R53 "120R" Res-0603 37.541,95.072 r180 top
R54 "22R" Res-0201 39.253,95.558 r90 top
R55 "22R" Res-0201 39.964,95.558 r90 top
R56 "22R" Res-0201 15.847,92.674 r270 top
R57 "22R" Res-0201 14.577,92.674 r270 top
R58 "0R" Res-0402 15.847,83.293 r270 top
R59 "0R" Res-0402 14.577,83.293 r270 top
R60 "40mR" Res-1206 10.814,20.745 r0 top
R61 "40mR" Res-1206 47.17,20.745 r0 top
R62 "40mR" Res-1206 83.467,20.745 r0 top
R63 "40mR" Res-1206 119.767,20.745 r0 top
R64 "1K" Res-0402 10.439,22.879 r270 top
R65 "1K" Res-0402 46.785,22.879 r270 top
R66 "1K" Res-0402 83.082,22.879 r270 top
R67 "1K" Res-0402 119.382,22.879 r270 top
R68 "20K" Res-0402 10.353,27.095 r180 top
R69 "20K" Res-0402 46.709,27.095 r180 top
R70 "20K" Res-0402 83.006,27.095 r180 top
R71 "20K" Res-0402 119.306,27.095 r180 top
R72 "1K" Res-0402 36.332,29.165 r90 top
R73 "1K" Res-0402 72.695,29.165 r90 top
R74 "1K" Res-0402 109.027,29.165 r90 top
R75 "1K" Res-0402 145.374,29.165 r90 top
R76 "240R" Res-0402 26.504,21.998 r270 top
R77 "240R" Res-0402 62.784,21.99 r270 top
R78 "10K" Res-0402 18.25,21.998 r90 top
R79 "10K" Res-0402 54.53,21.99 r90 top
R80 "10K" Res-0402 26.034,11.304 r180 top
R81 "10K" Res-0402 62.314,11.296 r180 top
R82 "470R" Res-0402 18.72,11.304 r0 top
R83 "470R" Res-0402 55,11.296 r0 top
R84 "240R" Res-0402 32.06,21.998 r270 top
R85 "240R" Res-0402 68.34,21.99 r270 top
R86 "240R" Res-0402 99.08,21.99 r270 top
R87 "240R" Res-0402 135.381,21.998 r270 top
R88 "10K" Res-0402 90.827,21.99 r90 top
R89 "10K" Res-0402 127.127,21.998 r90 top
R90 "10K" Res-0402 98.61,11.296 r180 top
R91 "10K" Res-0402 134.911,11.304 r180 top
R92 "470R" Res-0402 91.297,11.296 r0 top
R93 "470R" Res-0402 127.597,11.304 r0 top
R94 "240R" Res-0402 104.637,21.99 r270 top
R95 "240R" Res-0402 140.937,21.998 r270 top
R96 "4.7K" Res-0402 122.365,60.055 r270 top
R97 "4.7K" Res-0402 122.365,61.821 r90 top
R98 "DNP" Res-0402 105.639,62.106 r180 top
R99 "4.7K" Res-0402 103.835,62.106 r0 top
R100 "12.1k" Res-0402 113.935,69.374 r270 top
R101 "10K" Res-0402 121.895,63.231 r180 top
R102 "10K" Res-0402 104.877,59.137 r0 top
R103 "49.9R" Res-0603 123.774,94.177 r180 top
R104 "49.9R" Res-0603 100.334,94.177 r180 top
R105 "49.9R" Res-0603 126.416,94.177 r0 top
R106 "49.9R" Res-0603 102.977,94.177 r0 top
R107 "10K" Res-0201 127.864,59.662 r270 top
R108 "49.9R" Res-0603 129.896,94.177 r180 top
R109 "49.9R" Res-0603 106.456,94.177 r180 top
R110 "49.9R" Res-0603 132.537,94.177 r0 top
R111 "49.9R" Res-0603 109.097,94.177 r0 top
R112 "0R" Res-0402 128.384,92.856 r0 top
R113 "0R" Res-0402 104.945,92.856 r0 top
R114 "330R" Res-0603 136.576,110.216 r90 top
R115 "330R" Res-0603 113.182,110.216 r90 top
R116 "10K" Res-0402 139.154,97.459 r0 top
R117 "330R" Res-0603 138.443,99.372 r270 top
R118 "10K" Res-0402 135.331,109.924 r270 top
R119 "10K" Res-0402 111.862,109.924 r270 top
R120 "10K" Res-0402 89.789,97.453 r0 top
R121 "330R" Res-0603 89.078,99.372 r270 top
R122 "100K" Res-0402 17.297,70.117 r270 top
SW1 "B3U-1000P" B3U-1000P 59.454,59.783 r270 top
SW2 "DSIC03LSGET" DSIC03LSGET 52.984,67.71 r90 top
SW3 "B3U-1000P" B3U-1000P 104.877,56.064 r0 top
TP1 "TEST POINT" Test-point 7.112,74.39 r90 top
TP2 "TEST POINT" Test-point 7.112,77.438 r90 top
TP3 "TEST POINT" Test-point 7.112,80.74 r90 top
TP4 "TEST POINT" Test-point 7.112,84.042 r90 top
TP5 "TEST POINT" Test-point 100.609,56.064 r0 top
U1 "STM32G0B1RET6" LQFP-64(10x10) 76.556,61.563 r0 top
U2 "PCF8574APWR" TSSOP-20 53.055,53.156 r0 top
U3 "AP63300WU-7" TSOT-23-6 32.766,58.515 r0 top
U4 "BL8071CLATR33" "SOT- 223" 32.459,72.143 r90 top
U5 "TCAN1463DMTRQ1" VSON-14(3x4.5) 75.958,90.897 r90 top
U6 "TCAN1463DMTRQ1" VSON-14(3x4.5) 54.544,90.897 r90 top
U7 "THVD2450DRBR" SON-8-EP(3x3) 38.588,88.484 r90 top
U8 "MAX3232ESE" SOP-16 19.022,88.182 r270 top
U9 "TLV9001IDCKR" SC-70-5 10.353,25.116 r180 top
U10 "TLV9001IDCKR" SC-70-5 46.709,25.116 r180 top
U11 "TLV9001IDCKR" SC-70-5 83.006,25.116 r180 top
U12 "TLV9001IDCKR" SC-70-5 119.306,25.116 r180 top
U13 "IS181GB" SOP-4_2.54 25.234,16.283 r270 top
U14 "IS181GB" SOP-4_2.54 61.514,16.275 r270 top
U15 "IS181GB" SOP-4_2.54 19.52,16.283 r90 top
U16 "IS181GB" SOP-4_2.54 55.8,16.275 r90 top
U17 "TLP2361(TPL,E(T" SO-5 30.79,16.283 r270 top
U18 "TLP2361(TPL,E(T" SO-5 67.07,16.275 r270 top
U19 "IS181GB" SOP-4_2.54 97.81,16.275 r270 top
U20 "IS181GB" SOP-4_2.54 134.111,16.283 r270 top
U21 "IS181GB" SOP-4_2.54 92.097,16.275 r90 top
U22 "IS181GB" SOP-4_2.54 128.397,16.283 r90 top
U23 "TLP2361(TPL,E(T" SO-5 103.367,16.275 r270 top
U24 "TLP2361(TPL,E(T" SO-5 139.667,16.283 r270 top
U25 "LAN9253-SVB QFN64" QFN-64-EP(9x9) 114.185,61.481 r0 top
U26 "CAT24C256WI-GT3" CAT24C256WI-GT3 127.229,64.078 r270 top
U27 "SI7145DP-T1-GE3" PowerPAK-SO-8 13.818,67.742 r180 top
X1 "DNP" MC-306 61.893,69.628 r180 top value=32.786kHz
X2 "8MHz" 5TJ480000XYLBC_ 65.638,55.097 r0 top
X3 "25MHz" SMD3225-4P 104.469,68.007 r270 top

## Footprints (in the part's own frame and the unit in brackets; to place one, negate y for a bottom-side part, rotate by r counter-clockwise, add the part's x,y. Pads: shape width x height; smd on the part's side, far side on the other; paste and mask are expansions set on the pad)
5TJ480000XYLBC_ [mm]
  rect 1.8x1.3 smd mask+0.07: 1(-1.9,-1.15) 2(1.9,-1.15) 3(1.9,1.15) 4(-1.9,1.15)
  silkscreen extent -3.05,-1.65 2.54,1.65, body extent -2.5,-1.6 2.5,1.6, height 1
178.6165.0002 [mm]
  rect 2.2x2.2 hole 1.5 paste-2539.97 mask+0.051: 1(-6.4,1.25)
  round 2.2 hole 1.5 paste-2539.97 mask+0.051: 2(-2.9,1.25) 3(2.9,1.25) 4(6.4,1.25) 5(6.4,-1.25) 6(2.9,-1.25) 7(-2.9,-1.25) 8(-6.4,-1.25)
  round 0 hole 2.5 unplated paste-2539.97: ""(0,0)
  silkscreen extent -10.03,-3.05 10.03,3.05, body extent -10,-3 10,3, height 17.5
0630CDMCCDS_6R8MC [mm]
  rect 2.35x3.5 smd: 1(-3.025,0) 2(3.025,0)
  silkscreen extent -3.71,-3.3 3.71,3.3, body extent -3.65,-3.3 3.65,3.3, height 3
1715721 [mm]
  rect 2.5x2.5 / inner round 2.5 / far side rect 2.5x2.5 hole 1.3: 1(-2.54,0)
  round 2.5 hole 1.3: 2(2.54,0)
  silkscreen extent -5.08,-4.6 5.08,5.2, body extent -5.64,-4.62 5.09,5.21, height 14.2
B3U-1000P [mm] "SWITCH TACTILE SPST-NO 0.05A 12V"
  rect 0.82x1.72 smd: 1(-1.7,0) 2(1.7,0)
  silkscreen extent -1.57,-1.3 1.57,1.3, body extent -2,-1.26 2,1.24, height 1.6
Cap-0402 [mil]
  rect 18x25 smd mask+2.36: 1(-18.5,0) 2(18.5,0)
  silkscreen extent -31,-16 31,16, body extent -20,-10 20,10, height 19
cap-0402 [mil]
  rect 18x25 smd mask+2.36: 1(-18.5,0) 2(18.5,0)
  silkscreen extent -31,-16 31,16, body extent -20,-10 20,10, height 19
Cap-0603 [mil]
  rect 30x35 smd mask+2.36: 1(-30,0) 2(30,0)
  silkscreen extent -49,-21 49,21, body extent -32,-16 31,16, height 34
Cap-0805 [mil] "SMD 0805"
  rect 40x60 smd mask+2.76: 1(-40,0) 2(40,0)
  silkscreen extent -64,-34 64,34, body extent -39,-25 39,25, height 30
Cap-1206 [mil] "SMD 1206"
  rect 60x70 smd: 1(-50,0) 2(50,0)
  silkscreen extent -84,-39 84,39, body extent -63,-31 63,32, height 39
CAT24C256WI-GT3 [mm]
  rect 1.57x0.62 smd: 1(-2.7,1.905) 2(-2.7,0.635) 3(-2.7,-0.635) 4(-2.7,-1.905) 5(2.7,-1.905) 6(2.7,-0.635) 7(2.7,0.635) 8(2.7,1.905)
  silkscreen extent -3,-2.44 1.85,2.64, body extent -3,-2.45 3,2.45, height 1.75
DB128L-5.08-3P-BK-S [mm]
  round 3 hole 1.6 paste-2539.97 mask+0.051: 1(-5.08,0) 2(0,0) 3(5.08,0)
  silkscreen extent -7.73,-4.85 8.22,5.15, body extent -7.62,-4.9 8.22,5.1, height 14
DSIC03LSGET [mil]
  rect 90x60 smd paste+0 mask+2: 1(-177.16,100) 2(-177.16,0) 3(-177.16,-100) 4(177.16,-100) 5(177.16,0) 6(177.16,100)
  silkscreen extent -118,-150 118,150, body extent -183,-150 183,150, height 163
DSN0603-2 [mm]
  rect 0.2x0.24 smd mask+0.055: 1(-0.2,0) 2(0.2,0)
  silkscreen extent -0.38,-0.2 0.38,0.2, body extent -0.3,-0.15 0.3,0.15, height 0.32
Fuse-1812_ [mm]
  rect 1.78x3.2 smd: 1(-2.49,0) 2(2.49,0)
  silkscreen extent -1.75,-1.8 1.85,1.8, body extent -2.36,-1.74 2.37,1.74, height 1.03
HDR1X2_ [mm] "CONN HEADER VERT 2POS 2.54MM"
  rect 1.5x1.5 hole 0.9: 1(0,0)
  round 1.5 hole 0.9: 2(2.54,0)
  silkscreen extent -1.27,-1.27 3.81,1.27, body extent -1.27,-1.27 3.81,1.27, height 8.44
HDR1X3_ [mm] "Connector; Header; 3 Position"
  rect 1.5x1.5 hole 0.9: 1(0,0)
  round 1.5 hole 0.9: 2(2.54,0) 3(5.08,0)
  silkscreen extent -1.27,-1.27 6.35,1.27, body extent -1.27,-1.24 6.35,1.25, height 8.54
HDR1X4_ [mm] "Connector; Header; 4 Position"
  rect 1.6x1.6 hole 0.95: 1(0,0)
  round 1.6 hole 0.95: 2(2.54,0) 3(5.08,0) 4(7.62,0)
  silkscreen extent -1.27,-1.27 8.89,1.27, body extent -1.27,-1.27 8.89,1.27, height 9.5
"HDR 1x8 TH male" [mm]
  rect 1.8x1.8 hole 1 paste-2539.97 mask+0.051: 1(-8.89,0)
  round 1.8 hole 1 paste-2539.97 mask+0.051: 2(-6.35,0) 3(-3.81,0) 4(-1.27,0) 5(1.27,0) 6(3.81,0) 7(6.35,0) 8(8.89,0)
  silkscreen extent -10.16,-1.27 10.16,1.27, body extent -10.26,-1.25 10.27,1.25, height 8.5
HF33F/024-ZS3 [mm]
  round 2.5 hole 1.4 paste-2539.97 mask+0.051: 1(-8.9,-3.81) 2(-8.9,3.81) 3(1.3,-3.81) 4(8.9,-3.81) 5(6.4,3.81)
  silkscreen extent -10.9,-5.16 9.7,5.16, body extent -10.86,-5.11 9.64,5.1, height 16.9
HR911105A [mm]
  rect 1.398x1.398 hole 0.89: 1(4.45,-4.355)
  round 1.398 hole 0.89: 2(3.18,-6.895) 3(1.91,-4.355) 4(0.64,-6.895) 5(-0.63,-4.355) 6(-1.9,-6.895) 7(-3.17,-4.355) 8(-4.44,-6.895)
  round 1.53 hole 1.02: 9(6.625,6.895) 10(4.085,6.895) 11(-4.085,6.895) 12(-6.625,6.895)
  round 0 hole 3.25 unplated: MH1(-5.715,1.995) MH2(5.715,1.995)
  round 2.445 hole 1.63: "Shield 1"(-7.745,-1.055) "Shield 2"(7.745,-1.055)
  silkscreen extent -8,-8.48 8,12.92, body extent -8.02,-8.42 8.02,12.88, height 13.5
IND-0402 [mm]
  rect 0.4x0.6 smd: 1(-0.35,0) 2(0.35,0)
  silkscreen extent -0.71,-0.46 0.71,0.46, body extent -0.5,-0.25 0.5,0.25, height 0.25
"IND-0603 (1608 Metric)" [mm] "0.063\" L x 0.032\" W (1.60mm x 0.80mm)"
  rect 0.6x0.8 smd: 1(-0.7,0) 2(0.7,0)
  silkscreen extent -0.2,-0.46 0.23,0.46, body extent -0.8,-0.4 0.8,0.4, height 0.78
LED-0603 [mm]
  rect 0.5x1 smd: 1(-0.75,0) 2(0.75,0)
  silkscreen extent -1.12,-0.66 1.75,0.66, body extent -0.82,-0.37 0.82,0.36, height 0.68
LQFP-64(10x10) [mm]
  rect 1.2x0.3 smd paste+0 mask+0.051: 1(-5.75,3.75) 2(-5.75,3.25) 3(-5.75,2.75) 4(-5.75,2.25) 5(-5.75,1.75) 6(-5.75,1.25) 7(-5.75,0.75) 8(-5.75,0.25) 9(-5.75,-0.25) 10(-5.75,-0.75) 11(-5.75,-1.25) 12(-5.75,-1.75) 13(-5.75,-2.25) 14(-5.75,-2.75) 15(-5.75,-3.25) 16(-5.75,-3.75) 33(5.75,-3.75) 34(5.75,-3.25) 35(5.75,-2.75) 36(5.75,-2.25) 37(5.75,-1.75) 38(5.75,-1.25) 39(5.75,-0.75) 40(5.75,-0.25) 41(5.75,0.25) 42(5.75,0.75) 43(5.75,1.25) 44(5.75,1.75) 45(5.75,2.25) 46(5.75,2.75) 47(5.75,3.25) 48(5.75,3.75)
  rect 0.3x1.2 smd paste+0 mask+0.051: 17(-3.75,-5.75) 18(-3.25,-5.75) 19(-2.75,-5.75) 20(-2.25,-5.75) 21(-1.75,-5.75) 22(-1.25,-5.75) 23(-0.75,-5.75) 24(-0.25,-5.75) 25(0.25,-5.75) 26(0.75,-5.75) 27(1.25,-5.75) 28(1.75,-5.75) 29(2.25,-5.75) 30(2.75,-5.75) 31(3.25,-5.75) 32(3.75,-5.75) 49(3.75,5.75) 50(3.25,5.75) 51(2.75,5.75) 52(2.25,5.75) 53(1.75,5.75) 54(1.25,5.75) 55(0.75,5.75) 56(0.25,5.75) 57(-0.25,5.75) 58(-0.75,5.75) 59(-1.25,5.75) 60(-1.75,5.75) 61(-2.25,5.75) 62(-2.75,5.75) 63(-3.25,5.75) 64(-3.75,5.75)
  silkscreen extent -6.64,-5 5,5, body extent -6,-6 6,6, height 1.6
MC-306 [mm]
  rect 1.3x1.9 smd: 1(-2.75,-1.6) 2(2.75,-1.6) 3(2.75,1.6) 4(-2.75,1.6)
  silkscreen extent -4.06,-1.96 4.06,1.96, body extent -4,-1.9 4,1.9, height 2.54
PowerPAK-SO-8 [mm]
  rect 1.15x0.7 smd paste+0 mask+0.051: 1(-1.963,1.905) 2(-1.967,0.635) 3(-1.967,-0.635) 4(-1.963,-1.905)
  rect 1x1 smd: 5_6(1.967,0)
  rect 0.595x0.61 smd paste+0 mask+0.051: 7(0.813,2.388) 8(0.813,-2.388)
  Top Layer region: 4.317,-2.4 4.317,2.4 2.667,2.4 2.667,2.15 -0.383,2.15 -0.383,-2.15 2.667,-2.15 2.667,-2.4 4.317,-2.4
  silkscreen extent -2.8,-2.6 2.87,2.6, body extent -2.24,-2.57 3.91,2.57, height 1.24
QFN-64-EP(9x9) [mm]
  rect 0.762x0.254 smd: 1(-4.4,3.75)
  rect 0.7x0.25 smd: 2(-4.4,3.25) 3(-4.4,2.75) 4(-4.4,2.25) 5(-4.4,1.75) 6(-4.4,1.25) 7(-4.4,0.75) 8(-4.4,0.25) 9(-4.4,-0.25) 10(-4.4,-0.75) 11(-4.4,-1.25) 12(-4.4,-1.75) 13(-4.4,-2.25) 14(-4.4,-2.75) 15(-4.4,-3.25) 16(-4.4,-3.75) 33(4.4,-3.75) 34(4.4,-3.25) 35(4.4,-2.75) 36(4.4,-2.25) 37(4.4,-1.75) 38(4.4,-1.25) 39(4.4,-0.75) 40(4.4,-0.25) 41(4.4,0.25) 42(4.4,0.75) 43(4.4,1.25) 44(4.4,1.75) 45(4.4,2.25) 46(4.4,2.75) 47(4.4,3.25) 48(4.4,3.75)
  rect 0.25x0.7 smd: 17(-3.75,-4.4) 18(-3.25,-4.4) 19(-2.75,-4.4) 20(-2.25,-4.4) 21(-1.75,-4.4) 22(-1.25,-4.4) 23(-0.75,-4.4) 24(-0.25,-4.4) 25(0.25,-4.4) 26(0.75,-4.4) 27(1.25,-4.4) 28(1.75,-4.4) 29(2.25,-4.4) 30(2.75,-4.4) 31(3.25,-4.4) 32(3.75,-4.4) 49(3.75,4.4) 50(3.25,4.4) 51(2.75,4.4) 52(2.25,4.4) 53(1.75,4.4) 54(1.25,4.4) 55(0.75,4.4) 56(0.25,4.4) 57(-0.25,4.4) 58(-0.75,4.4) 59(-1.25,4.4) 60(-1.75,4.4) 61(-2.25,4.4) 62(-2.75,4.4) 63(-3.25,4.4) 64(-3.75,4.4)
  rect 7.15x7.15 smd: 65(0,0)
  silkscreen extent -5,-4.5 4.54,4.5, body extent -4.52,-4.52 4.52,4.52, height 0.9
Res-0201 [mm]
  rect 0.27x0.37 smd mask+0.055: 1(-0.275,0) 2(0.275,0)
  silkscreen extent -0.48,-0.25 0.48,0.25, body extent -0.3,-0.15 0.3,0.15, height 0.29
Res-0402 [mil]
  rect 18x25 smd mask+2.17: 1(-18.5,0) 2(18.5,0)
  silkscreen extent -32,-17 32,16, body extent -23,-11 23,11, height 16
Res-0603 [mil]
  rect 30x35 smd: 1(-30,0) 2(30,0)
  silkscreen extent -48,-21 48,21, body extent -31,-17 31,17, height 18
Res-1206 [mil]
  rect 60x70 smd: 1(-50,0) 2(50,0)
  silkscreen extent -84,-39 84,39, body extent -63,-31 63,31, height 24
SC-70-5 [mm]
  rect 0.73x0.38 smd: 1(-0.95,0.65) 2(-0.95,0) 3(-0.95,-0.65) 4(0.95,-0.65) 5(0.95,0.65)
  silkscreen extent -1.57,-1.04 0.46,1.04, body extent -1.05,-1 1.05,1, height 0.95
"SMB Bi Directional" [mm]
  rect 2.8x2.4 smd: 1(-2.3,0) 2(2.3,0)
  silkscreen extent -2.21,-1.85 2.39,1.85, body extent -2.7,-1.8 2.7,1.8, height 2.3
SMB_ [mm]
  rect 2.8x2.4 smd: 1(-2.3,0) 2(2.3,0)
  silkscreen extent -2.21,-1.91 4.83,1.9, body extent -2.7,-1.8 2.7,1.8, height 2.3
SMD3225-4P [mm]
  rect 1.4x1.2 smd: 1(-1.1,-0.85) 2(1.1,-0.85) 3(1.1,0.85) 4(-1.1,0.85)
  silkscreen extent -2.08,-1.3 1.65,1.3, body extent -1.6,-1.25 1.6,1.25, height 0.81
SO-5 [mm]
  rect 1.4x0.8 smd paste+0 mask+0.051: 1(-3.15,1.27) 3(-3.175,-1.27) 4(3.15,-1.27) 5(3.175,0) 6(3.15,1.27)
  silkscreen extent -4.12,-1.9 2.3,1.9, body extent -3.5,-1.85 3.5,1.85, height 2.2
SOD-123 [mm]
  rect 0.95x0.9 smd: 1(-1.575,0) 2(1.575,0)
  silkscreen extent -1.37,-0.8 2.82,0.8, body extent -1.82,-0.78 1.83,0.78, height 1.5
SOD-323 [mm]
  rect 0.8x0.9 smd mask+0.055: 1(-1.15,0) 2(1.15,0)
  silkscreen extent -2.01,-0.79 0.94,0.79, body extent -1.3,-0.67 1.3,0.67, height 1.1
SOD-923. [mm]
  rect 0.36x0.27 smd: 1(-0.42,0) 2(0.42,0)
  silkscreen extent -0.99,-0.43 0.46,0.43, body extent -0.52,-0.32 0.53,0.33, height 0.43
SON-8-EP(3x3) [mm]
  rect 0.6x0.3 smd paste+0 mask+0.051: 1(-1.4,0.975) 2(-1.4,0.325) 3(-1.4,-0.325) 4(-1.4,-0.975) 5(1.4,-0.975) 6(1.4,-0.325) 7(1.4,0.325) 8(1.4,0.975)
  rect 1.65x2.4 smd paste+0 mask+0.051: 9(0,0)
  silkscreen extent -2.01,-1.47 1.47,1.47, body extent -1.51,-1.5 1.51,1.5, height 1.01
SOP-4_2.54 [mm]
  rect 1.45x0.8 smd: 1(-3.125,1.27) 2(-3.125,-1.27) 3(3.125,-1.27) 4(3.125,1.27)
  silkscreen extent -4.14,-2.06 1.68,2.06, body extent -3.43,-2 3.43,2, height 2.02
SOP-16 [mil]
  rect 57.55x22 smd: 1(-107.27,175) 2(-107.27,125) 3(-107.27,75) 4(-107.27,25) 5(-107.27,-25) 6(-107.27,-75) 7(-107.27,-125) 8(-107.27,-175) 9(107.27,-175) 10(107.27,-125) 11(107.27,-75) 12(107.27,-25) 13(107.27,25) 14(107.27,75) 15(107.27,125) 16(107.27,175)
  silkscreen extent -149,-199 84,199, body extent -122,-197 122,197, height 69
SOT-23 [mm] "TRANS NPN 40V 0.6A SOT23"
  rect 0.82x0.92 smd: 1(-0.95,-1) 2(0.95,-1) 3(0,1)
  silkscreen extent -1.68,-1.3 1.55,0.81, body extent -1.5,-1.25 1.5,1.25, height 1.05
"SOT- 223" [mm]
  rect 1.5x2 smd: 1(-2.3,-3.05) 2(0,-3.05) 3(2.3,-3.05)
  rect 3.8x2 smd: 4(0,3.05)
  silkscreen extent -3.35,-3.2 3.3,1.8, body extent -3.25,-3.5 3.25,3.5, height 1.61
T44001 [mm]
  round 2.9 hole 1.9 paste-2539.97 mask+0.051: 1(-2.5,3.6) 1(-2.5,-3.6) 1(2.5,3.6) 1(2.5,-3.6)
  silkscreen extent -4,-4 4,4, body extent -4.1,-4.1 4.1,4.1, height 9.93
Test-point [mil]
  oct 60x60 smd: 1(0,0)
  silkscreen extent -37,-37 37,37
TSOT-23-6 [mm]
  rect 1x0.6 smd: 1(-1.2,0.95) 2(-1.2,0) 3(-1.2,-0.95) 4(1.2,-0.95) 5(1.2,0) 6(1.2,0.95)
  silkscreen extent -1.98,-1.5 0.86,1.5, body extent -1.41,-1.45 1.41,1.45, height 1
TSSOP-20 [mm]
  rect 1.6x0.32 smd: 1(-2.8,2.925) 2(-2.8,2.275) 3(-2.8,1.625) 4(-2.8,0.975) 5(-2.8,0.325) 6(-2.8,-0.325) 7(-2.8,-0.975) 8(-2.8,-1.625) 9(-2.8,-2.275) 10(-2.8,-2.925) 11(2.8,-2.925) 12(2.8,-2.275) 13(2.8,-1.625) 14(2.8,-0.975) 15(2.8,-0.325) 16(2.8,0.325) 17(2.8,0.975) 18(2.8,1.625) 19(2.8,2.275) 20(2.8,2.925)
  silkscreen extent -3.88,-3.3 1.95,3.3, body extent -3.2,-3.25 3.2,3.25, height 1.2
TYPE-C-31-M-12_ [mm]
  rect 0.6x1.2 smd: A1/B12(-3.2,2.375) A4/B9(-2.4,2.375) B1/A12(3.2,2.375) B4/A9(2.4,2.375)
  rect 0.3x1.2 smd: A5(-1.25,2.375) A6(-0.25,2.375) A7(0.25,2.375) A8(1.25,2.375) B5(1.75,2.375) B6(0.75,2.375) B7(-0.75,2.375) B8(-1.75,2.375)
  round 0 hole 0.62 unplated: MH(-2.89,1.305) MH(2.89,1.305)
  oval 0.9x2 hole 0.6 slot 1.7 at 90 deg: S1(4.325,1.805) S4(-4.325,1.805)
  oval 0.9x1.7 hole 0.6 slot 1.4 at 90 deg: S2(4.325,-2.375) S3(-4.325,-2.375)
  silkscreen extent -4.5,-3.57 4.5,0.44, body extent -4.47,-5.01 4.47,2.89, height 3.31
UCD-220uF-10mmDia [mm] "0.406\" L x 0.406\" W (10.30mm x 10.30mm)"
  rect 4x2.5 smd: 1(-4,0) 2(4,0)
  silkscreen extent -5.95,-5.21 5.13,5.21, body extent -5.45,-5.15 5.45,5.15, height 10.8
UWX1E101MCL1GB_ [mm]
  rect 5x2.8 smd: 1(-3.65,0) 2(3.65,0)
  silkscreen extent -5.21,-4.22 4.27,4.22, body extent -4.45,-4.15 4.45,4.15, height 5.4
VSON-14(3x4.5) [mm]
  rect 0.6x0.3 smd paste-100 mask+0.051: 1(-1.4,1.95) 2(-1.4,1.3) 3(-1.4,0.65) 4(-1.4,0) 5(-1.4,-0.65) 6(-1.4,-1.3) 7(-1.4,-1.95) 8(1.4,-1.95) 9(1.4,-1.3) 10(1.4,-0.65) 11(1.4,0) 12(1.4,0.65) 13(1.4,1.3) 14(1.4,1.95)
  rect 1.6x4.2 smd paste-100 mask+0.051: 15(0,0)
  silkscreen extent -1.97,-2.29 1.47,2.29, body extent -1.5,-2.25 1.5,2.25, height 1
WJ127-5.0-5P [mm]
  round 2.5 hole 1.3: 1(-10,0) 2(-5,0) 3(0,0) 4(5,0) 5(10,0)
  silkscreen extent -13,-3.91 12.55,4.34, body extent -12.98,-3.87 12.52,4.33, height 10.1
X12ADIWA3DY1027 [mm]
  round 1.5 hole 0.9 paste-2539.97 mask+0.051: 1(3.57,0.38) 2(2.55,2.16) 3(1.53,0.38) 4(0.51,2.16) 5(-0.51,0.38) 6(-1.53,2.16) 7(-2.55,0.38) 8(-3.57,2.16)
  round 0 hole 3.25 unplated paste-2539.97: ""(-6.35,-2.16) ""(6.35,-2.16)
  silkscreen extent -8,-7.16 8,8.04, body extent -7.97,-7.21 8.03,7.99, height 12.94

## Part data
C1 C2 C46 C49: library part CC0402GRNPO9BN300, "CAP CER 30PF 50V C0G/NPO 0402", Case Code (Imperial)=0402, Case Code (Metric)=1005, Dielectric=C0G, LCSC Part Number=C277479, Manufacturer=Yageo, Max Operating Temperature=125°C, Min Operating Temperature=-55°C, Tolerance=2%, Voltage Rating=50V, Case/Package=0402, ComponentLink1Description=https://datasheet.ciiva.com/13263/upy-gp-np0-16v-to-50v-8-3714-13263350.pdf?src-supplier=Mouser, ComponentLink1URL=https://datasheet.ciiva.com/13263/upy-gp-np0-16v-to-50v-8-3714-13263350.pdf?src-supplier=Mouser, Halogen Free=5694HalogenFree, Item Type=Capacitor, Lead Free=5697LeadFree, Length=0.039inch, Manufacturer Part Number=CC0402GRNPO9BN300, Mounting Technology="Surface Mount", Packaging="Tape and Reel", Pricing="1=0.1, 10=0.052, 50=0.0296, 100=0.023, 500=0.01728, 1000=0.01358, 2500=0.01235, 5000=0.01136 (USD)", RoHS=Yes, Series=CC, Stock=114930, Supplier=Digikey, Termination=SMD/SMT, Thickness=0.022inch, Voltage Rating (DC)=50V, Weight=2.3E-05oz, Width=0.02inch
C3 C4: library part CC0402CRNPO9BN6R8, "CAP CER 6.8PF 50V C0G/NPO 0402", Case Code (Imperial)=0402, Case Code (Metric)=1005, Dielectric=C0G, Insulation Resistance=10GR, LCSC Part Number=C189470, Manufacturer=Yageo, Max Operating Temperature=125°C, Min Operating Temperature=-55°C, Supplier Part Number=3247368, Tolerance=2%, Voltage Rating=50V, Case/Package=0402, Category="Ceramic Capacitors", ComponentLink1Description=https://datasheet.ciiva.com/11587/upy-gp-np0-16v-to-50v-8-11587182.pdf?src-supplier=Avnet, ComponentLink1URL=https://datasheet.ciiva.com/11587/upy-gp-np0-16v-to-50v-8-11587182.pdf?src-supplier=Avnet, Construction=Flat, Depth=0.5mm, Height=0.5mm, Item Type=Capacitor, Length=1mm, Manufacturer Part Number=CC0402CRNPO9BN6R8, Mounting Technology="Surface Mount", Packaging="Tape and Reel", Pricing="10000=0.0024, 40000=0.0022, 150000=0.0021, 400000=0.002, 1000000=0.0019 (USD)", Radiation Hardening=No, RoHS=Yes, RoHS Compliant=Yes, Series=CC, Stock=200000, Supplier="Future Electronics", Termination=SMD/SMT, Voltage Rating (DC)=50V, Weight=2.3E-05oz, Width=0.5mm
C5 C7 C15 C34 C35 C36 C37 C38 C39 C42 C43 C47 C48 C50 C51 C52 C53 C54 C56 C58 C59 C60 C61 C62 C63 C64: library part C1005X7R1H104KT000F, "CAP CER 0.1UF 50V X7R 0402", Dielectric=X7R, LCSC Part Number=C361198, Manufacturer=TDK, Tolerance=10%, Voltage=25V, Category="Ceramic Capacitors", ComponentLink1Description=LCSC, ComponentLink1URL=https://www.lcsc.com/product-detail/Multilayer-Ceramic-Capacitors-MLCC-SMD-SMT_TDK-C1005X7R1H104KT000F_C361198.html, Item Type=Capacitor, Manufacturer Part Number=C1005X7R1H104KT000F, RoHS=No, Supplier 1=Avnet, Supplier Part Number 1=C1005X7R1H104KT000F
C6: library part CC0402KRX5R6BB475, "CAP CER 4.7UF 10V X5R 0402", Case Code (Imperial)=0402, Case Code (Metric)=1005, LCSC Part Number=C326586, Manufacturer=Yageo, Max Operating Temperature=85°C, Min Operating Temperature=-55°C, Supplier Part Number 1=3871698, Tolerance=10%, Voltage Rating=10V, Capacitance=4.7uF, Case/Package=0402, Category="Ceramic Capacitors", ComponentLink1Description=http://www.yageo.com/documents/recent/UPY-GPHC_X5R_4V-to-50V_25.pdf?src-supplier=Digi-Key, ComponentLink1URL=http://www.yageo.com/documents/recent/UPY-GPHC_X5R_4V-to-50V_25.pdf?src-supplier=Digi-Key, Manufacturer Part Number=CC0402KRX5R6BB475, Mount="Surface Mount", Packaging="Cut Tape", Pricing 1="10000=0.02310, 50000=0.02100 (GBP)", RoHS=Yes, RoHS Compliant=Yes, Stock 1=20000, Supplier 1=Farnell
C8 C10 C22 C23 C24 C25: library part CC0402JRX7R7BB104, "CAP CER 0.1UF 16V X7R 0402", Case Code (Imperial)=0402, Case Code (Metric)=1005, Dielectric=X7R, LCSC Part Number=C541464, Manufacturer=Yageo, Max Operating Temperature=125°C, Min Operating Temperature=-55°C, Package Quantity=10000, Supplier Part Number=311-1676-1-ND, Tolerance=5%, Voltage Rating=16V, Case/Package=0402, Category="Ceramic Capacitors", ComponentLink1Description=https://datasheet.ciiva.com/13210/upy-gphc-x7r-6-3v-to-50v-8-12304-13210152.pdf?src-supplier=Mouser, ComponentLink1URL=https://datasheet.ciiva.com/13210/upy-gphc-x7r-6-3v-to-50v-8-12304-13210152.pdf?src-supplier=Mouser, Construction=Flat, Halogen Free="Halogen Free", Height=0.5mm, Item Type=Capacitor, Lead Free="Lead Free", Length=0.039inch, Manufacturer Part Number=CC0402JRX7R7BB104, Material=4241ConductorMaterial, Mounting Technology="Surface Mount", Packaging="Tape and Reel", Pricing="1=0.1, 10=0.046, 50=0.0262, 100=0.0203, 500=0.01528, 1000=0.012, 2500=0.01091, 5000=0.01004 (USD)", RoHS=Yes, RoHS Compliant=Yes, Series=CC, Stock=1659111, Supplier=Digikey, Thickness=0.022inch, Voltage Rating (DC)=16V, Width=0.02inch
C9: library part CC0603JRNPO9BN472, "CAP CER 4700PF 50V C0G/NPO 0603", LCSC Part Number=C576818, Manufacturer=Yageo, Supplier Part Number 1=13-CC0603JRNPO9BN472CT-ND, Category="Ceramic Capacitors", ComponentLink1Description=LCSC, ComponentLink1URL=https://www.lcsc.com/product-detail/Multilayer-Ceramic-Capacitors-MLCC-SMD-SMT_YAGEO-CC0603JRNPO9BN472_C576818.html, Item Type=Capacitor, Manufacturer Part Number=CC0603JRNPO9BN472, Pricing 1="1=0.48000, 10=0.33000, 50=0.23100, 100=0.19800, 500=0.14854, 1000=0.12543 (USD)", RoHS=Yes, RoHS Compliant=Yes, Stock 1=31779, Supplier 1=Digi-Key
C11: library part UCD1H221MNL1GS, "CAP ALUM 220UF 20% 50V SMD", Case/Package=Radial, LCSC Part Number=C116211, Leakage Current=3uA, Manufacturer=Nichicon, Max Operating Temperature=105°C, Min Operating Temperature=-55°C, Package Quantity=1, Ripple Current=700mA, Supplier Part Number 1=493-6390-1-ND, Tolerance=20%, Voltage=50V, Capacitance=220uF, Category="Aluminum Electrolytic Capacitors", ComponentLink1Description=https://datasheet.ciiva.com/11776/0900766b80ebdadd-11776792.pdf?src-supplier=RSComponents, ComponentLink1URL=https://datasheet.ciiva.com/11776/0900766b80ebdadd-11776792.pdf?src-supplier=RSComponents, ComponentLink2Description=https://datasheet.ciiva.com/5362/e-cd-22158-5362489.pdf?src-supplier=Mouser, ComponentLink2URL=https://datasheet.ciiva.com/5362/e-cd-22158-5362489.pdf?src-supplier=Mouser, ComponentLink3Description=https://datasheet.ciiva.com/11684/e-cd-11684678.pdf?src-supplier=Avnet, ComponentLink3URL=https://datasheet.ciiva.com/11684/e-cd-11684678.pdf?src-supplier=Avnet, ComponentLink4Description=https://datasheet.ciiva.com/15037/e-cd-15037119.pdf?src-supplier=Digi-Key, ComponentLink4URL=https://datasheet.ciiva.com/15037/e-cd-15037119.pdf?src-supplier=Digi-Key, ComponentLink5Description=https://datasheet.ciiva.com/16393/e-cd-16393493.pdf?src-supplier=Future+Electronics, ComponentLink5URL=https://datasheet.ciiva.com/16393/e-cd-16393493.pdf?src-supplier=Future+Electronics, ComponentLink6Description=https://datasheet.ciiva.com/17354/e-cd-17354606.pdf?src-supplier=Avnet+Europe, ComponentLink6URL=https://datasheet.ciiva.com/17354/e-cd-17354606.pdf?src-supplier=Avnet+Europe, Construction=Cylindrical, Diameter=10mm, Dissipation Factor=0.1%, Features="General Purpose", Height=10mm, Height - Seated (Max)=0.394inch, Impedance=160mR, Item Type=Capacitor, Lead Free="Lead Free", Length=10mm, Life (Hours)=5000Hour, Manufacturer Part Number=UCD1H221MNL1GS, Mount="Surface Mount,PCB", Packaging="Tape and Reel", Pricing 1="1=0.85000, 10=0.60200, 50=0.45480, 100=0.39620 (USD)", Radiation Hardening=No, RoHS=Yes, RoHS Compliant=Yes, Series=CD, Supplier 1=Digi-Key, Termination=SMD/SMT, Voltage Rating=50V, Voltage Rating (DC)=50V
C14: library part CC1206KKX5R9BB106, "CAP CER 10UF 50V X5R 1206", Case Code (Imperial)=1206, Case Code (Metric)=3216, Dielectric=X5R, LCSC Part Number=C100122, Manufacturer=Yageo, Max Operating Temperature=85°C, Min Operating Temperature=-55°C, Supplier Part Number=2072123, Tolerance=10%, Voltage Rating=50V, Case/Package=1206, ComponentLink1Description=https://datasheet.octopart.com/CC1206KKX5R9BB106-Yageo-datasheet-170350636.pdf?src-supplier=Future+Electronics, ComponentLink1URL=https://datasheet.octopart.com/CC1206KKX5R9BB106-Yageo-datasheet-170350636.pdf?src-supplier=Future+Electronics, ComponentLink2Description=https://datasheet.octopart.com/CC1206KKX5R9BB106-Yageo-datasheet-145016144.pdf?src-supplier=Future+Electronics, ComponentLink2URL=https://datasheet.octopart.com/CC1206KKX5R9BB106-Yageo-datasheet-145016144.pdf?src-supplier=Future+Electronics, ComponentLink3Description=http://www.yageo.com/documents/recent/UPY-GPHC_X5R_4V-to-50V_25.pdf?src-supplier=Digikey, ComponentLink3URL=http://www.yageo.com/documents/recent/UPY-GPHC_X5R_4V-to-50V_25.pdf?src-supplier=Digikey, Halogen Free="Halogen Free", Height=1.9mm, Item Type=Capacitors, Lead Free="Lead Free", Length=0.126inch, Manufacturer Part Number=CC1206KKX5R9BB106, Material=4241ConductorMaterial, Mounting Technology="Surface Mount", Packaging="Cut Tape", Pricing="2000=0.0907, 6000=0.0872, 10000=0.0856, 30000=0.0823, 50000=0.0795 (USD)", RoHS=Yes, RoHS Compliant=Yes, Series=CC, Stock=220000, Supplier="Future Electronics", Thickness=0.075inch, Voltage Rating (DC)=50V, Width=0.063inch
C16: library part C1005X5R1H104K050BB, "CAP CER 0.1UF 50V X5R 0402", Capacitance=100nF, Case Code (Imperial)=0402, Case Code (Metric)=1005, Dielectric=X5R, Dielectric Material=Ceramic, LCSC Part Number=C2181865, Manufacturer=TDK, Max Operating Temperature=85°C, Min Operating Temperature=-55°C, Package Quantity=1, Supplier Part Number 1=445-5942-1-ND, Tolerance=10%, Voltage=50V, Case/Package=0402, ComponentLink1Description=https://product.tdk.com/info/en/catalog/spec/mlccspec_commercial_general_midvoltage_en.pdf?src-supplier=Digi-Key, ComponentLink1URL=https://product.tdk.com/info/en/catalog/spec/mlccspec_commercial_general_midvoltage_en.pdf?src-supplier=Digi-Key, ComponentLink2Description=http://www.tdk.co.jp/tefe02/e413_c.pdf?src-supplier=Future+Electronics, ComponentLink2URL=http://www.tdk.co.jp/tefe02/e413_c.pdf?src-supplier=Future+Electronics, ComponentLink3Description=https://www.verical.com/server-webapp/html/getDatasheet?partID=743571&src-supplier=Verical, ComponentLink3URL=https://www.verical.com/server-webapp/html/getDatasheet?partID=743571&src-supplier=Verical, ComponentLink4Description=http://www.tdk.co.jp/tefe02/e412_c.pdf?src-supplier=Avnet+Europe, ComponentLink4URL=http://www.tdk.co.jp/tefe02/e412_c.pdf?src-supplier=Avnet+Europe, Construction=Flat, Depth=0.5mm, Height=0.5mm, Item Type=Capacitor, Lead Free="Lead Free", Length=1mm, Manufacturer Part Number=C1005X5R1H104K050BB, Mount="Surface Mount", Packaging="Tape and Reel", Pricing 1="1=0.12, 10=0.09, 50=0.049, 100=0.04, 500=0.02858, 1000=0.02245, 2500=0.02041, 5000=0.01878 (USD)", Radiation Hardening=No, REACH SVHC="No SVHC", Resistor Type=Ceramic, RoHS Compliant=Yes, Series=C, Stock 1=1455182, Supplier 1=Digi-Key, Termination=SMD/SMT, Thickness=0.022inch, Voltage Rating=50V, Voltage Rating (DC)=50V, Weight=2.3E-05oz, Width=0.02inch
C17: library part GCM1555C1H470FA16D, "CAP CER 47PF 50V C0G/NP0 0402", Case Code (Imperial)=0402, Case Code (Metric)=1005, LCSC Part Number=C393684, Manufacturer=Murata, Max Operating Temperature=125°C, Min Operating Temperature=-55°C, Ratings=AEC-Q200, Supplier Part Number 1=490-16445-1-ND, Tolerance=1%, Voltage Rating=50V, Capacitance=47pF, Case/Package=0402, Category="Ceramic Capacitors", ComponentLink1Description=http://search.murata.co.jp/Ceramy/image/img/A01X/G101/ENG/GCM1555C1H470FA16-01.pdf?src-supplier=Digi-Key, ComponentLink1URL=http://search.murata.co.jp/Ceramy/image/img/A01X/G101/ENG/GCM1555C1H470FA16-01.pdf?src-supplier=Digi-Key, Manufacturer Part Number=GCM1555C1H470FA16D, Mount="Surface Mount", Packaging="Tape and Reel", Pricing 1="1=0.11000, 10=0.07900, 50=0.04500, 100=0.03730, 500=0.02618, 1000=0.02168, 2500=0.02018, 5000=0.01846 (USD)", RoHS=No, Stock 1=27098, Supplier 1=Digi-Key
C18 C19: library part CC0805MKX5R8BB226, "CAP CER 22UF 25V X5R 0805", Case Code (Imperial)=0805, Case Code (Metric)=2012, Dielectric=X5R, LCSC Part Number=C784585, Manufacturer=Yageo, Max Operating Temperature=85°C, Min Operating Temperature=-55°C, Package Quantity=3000, Supplier Part Number 1=311-1903-1-ND, Tolerance=20%, Voltage Rating=25V, Capacitance=22uF, Case/Package=0805, Category="Ceramic Capacitors", ComponentLink1Description=http://www.mouser.com/ds/2/447/Yageo_UPY-GP_NP0_16V-to-50V_9-358835.pdf?src-supplier=Mouser, ComponentLink1URL=http://www.mouser.com/ds/2/447/Yageo_UPY-GP_NP0_16V-to-50V_9-358835.pdf?src-supplier=Mouser, ComponentLink2Description=http://www.yageo.com/documents/recent/UPY-GPHC_X5R_4V-to-50V_25.pdf?src-supplier=Digi-Key, ComponentLink2URL=http://www.yageo.com/documents/recent/UPY-GPHC_X5R_4V-to-50V_25.pdf?src-supplier=Digi-Key, Halogen Free="Halogen Free", Height=1.25mm, Item Type=Capacitor, Lead Free="Lead Free", Length=0.079inch, Manufacturer Part Number=CC0805MKX5R8BB226, Mount="Surface Mount", Packaging="Tape and Reel", Pricing 1="1=0.47000, 10=0.33300, 50=0.25140, 100=0.21900, 500=0.16222, 1000=0.13789 (USD)", RoHS=Yes, RoHS Compliant=Yes, Stock 1=64970, Supplier 1=Digi-Key, Termination=SMD/SMT, Thickness=0.057inch, Voltage Rating (DC)=25V, Weight=0.000194oz, Width=0.049inch